# Altium PCB Kasli-DIOT.PCBDOC (part 1 of 23)
Units mm, origin at the board's own origin, x right, y up, seen from the top; angles counter-clockwise.
Board outline 222.9 x 100 mm, 10 copper layers (TopLayer, Layer 2, Layer 3, Layer 4, Layer 5, Layer 6, Layer 7, layer 8, Layer 9, BottomLayer), stack 1.564 mm thick; 977 components, 900 nets, 4676 pads, 2725 vias.
Unrouted connection lines stored in the file: 17.
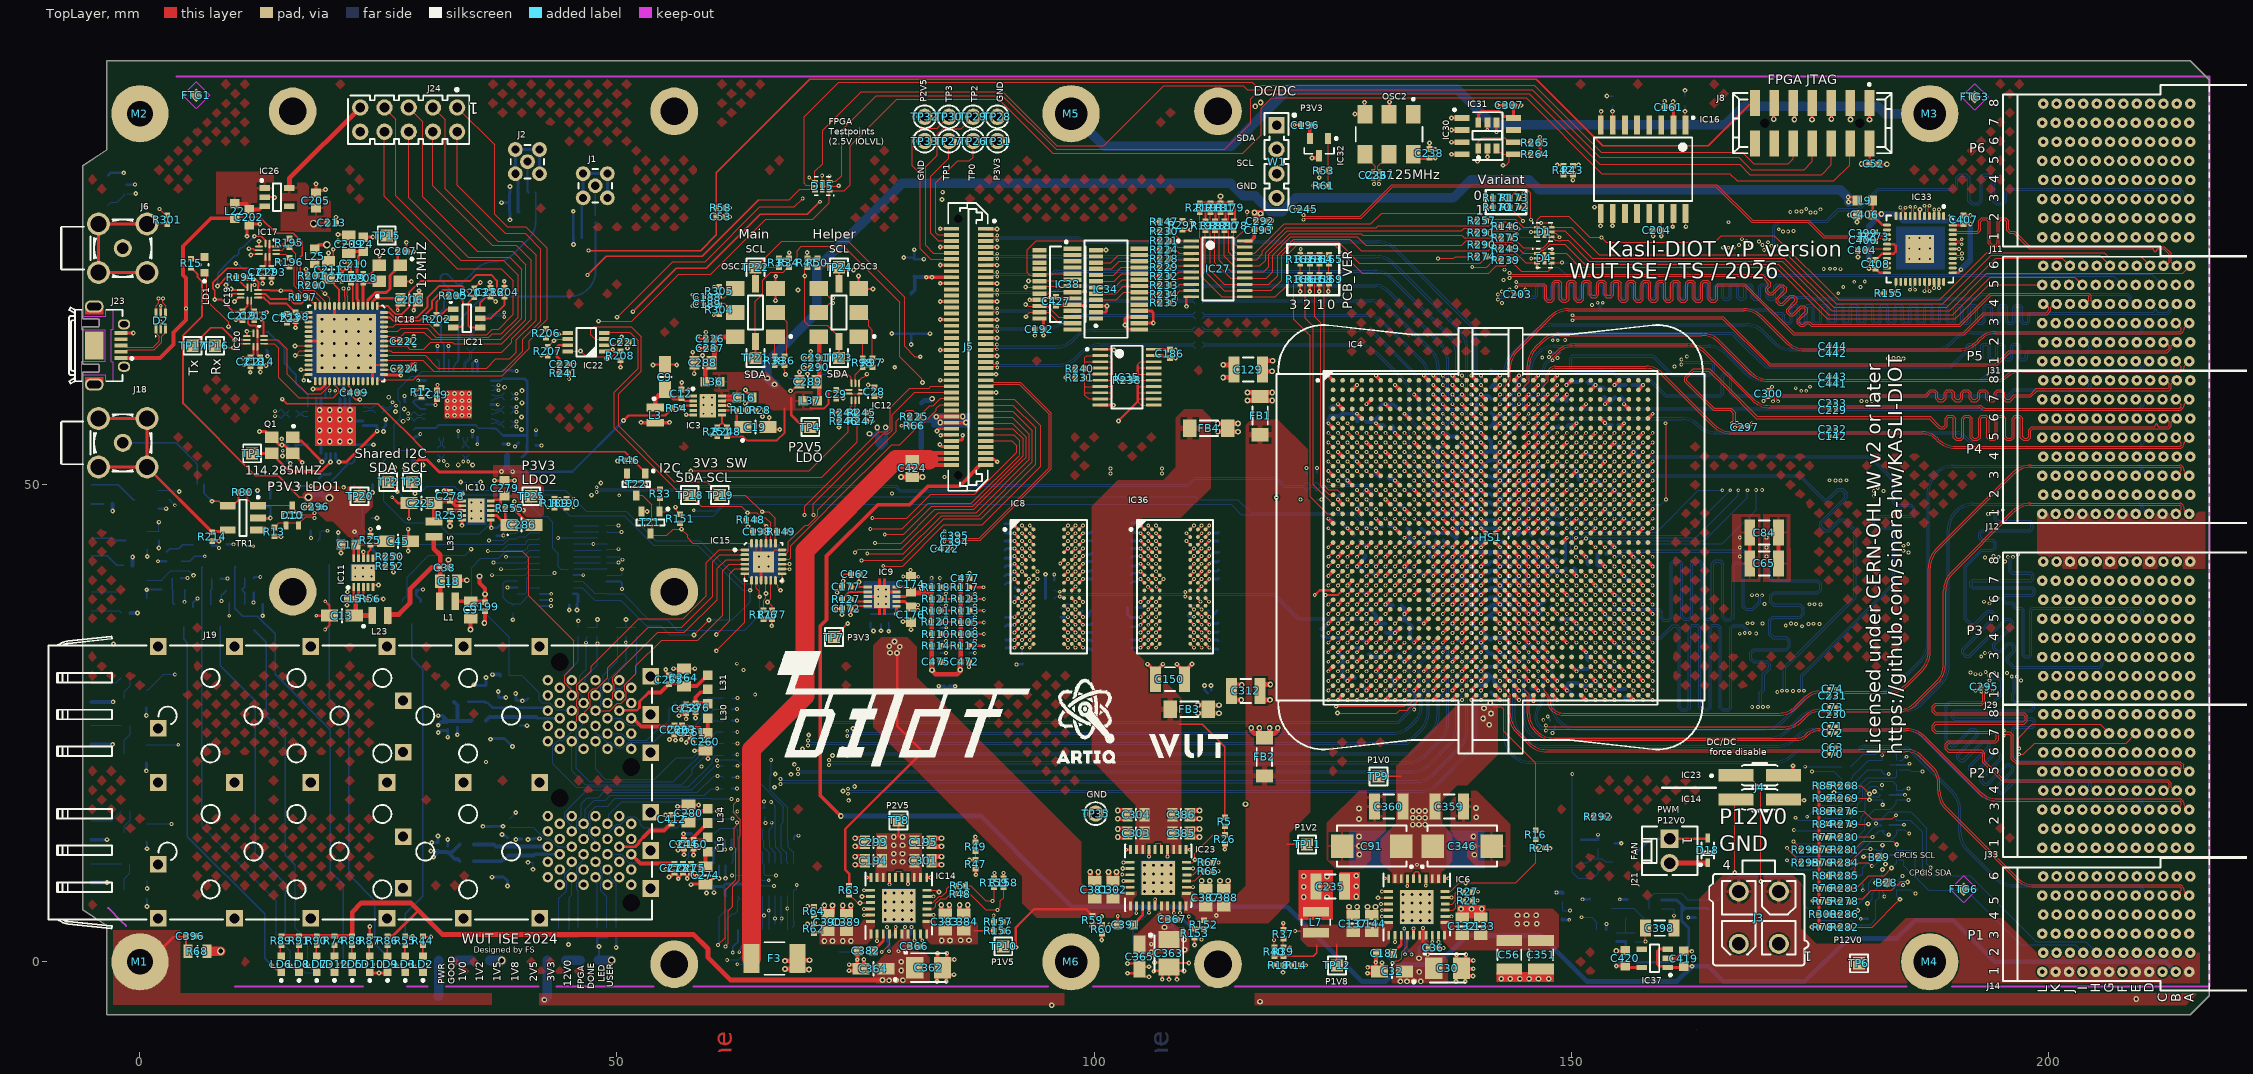
[diagram p0: TopLayer view]
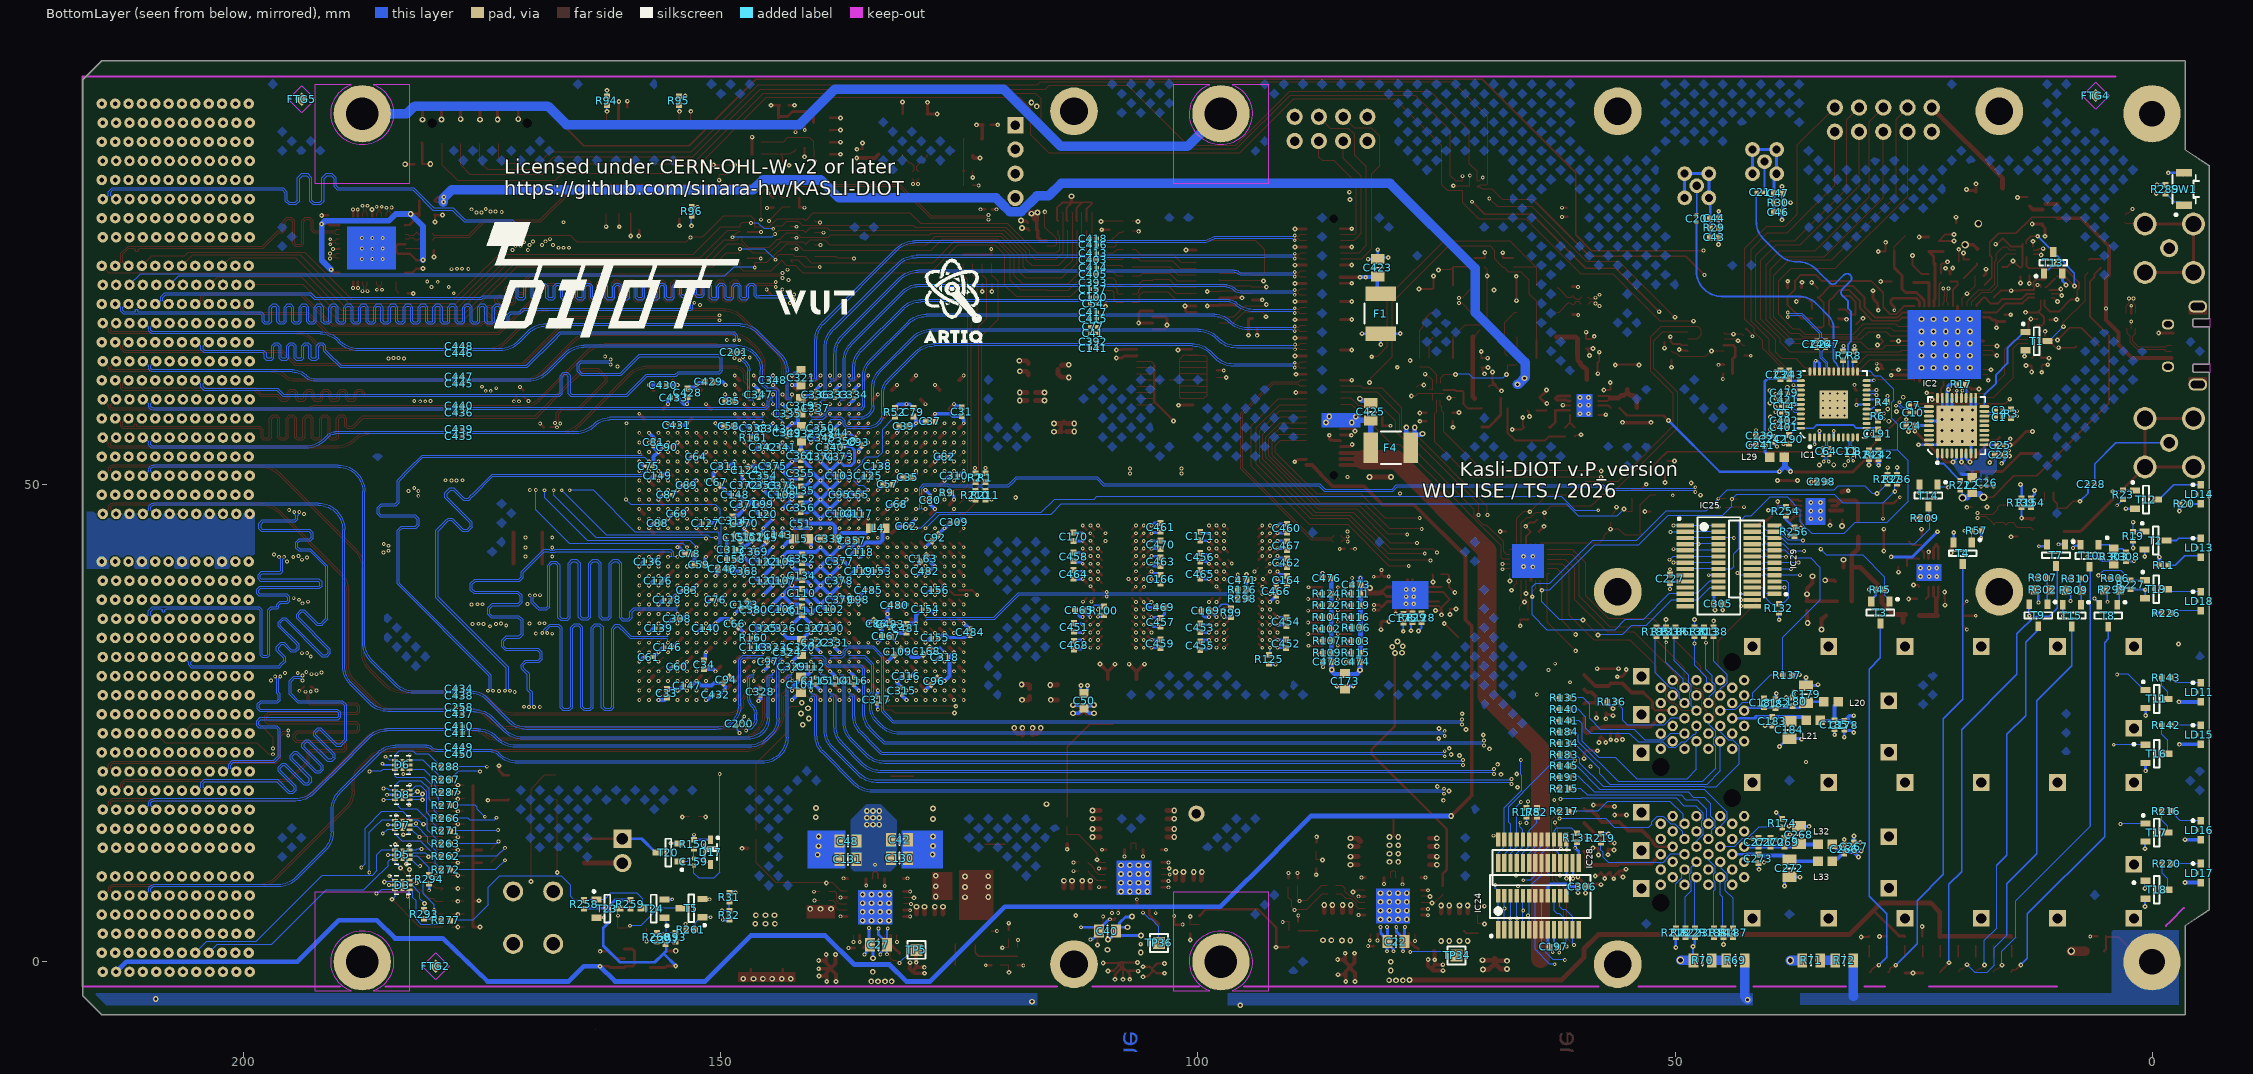
[diagram p1: BottomLayer view, seen from below]
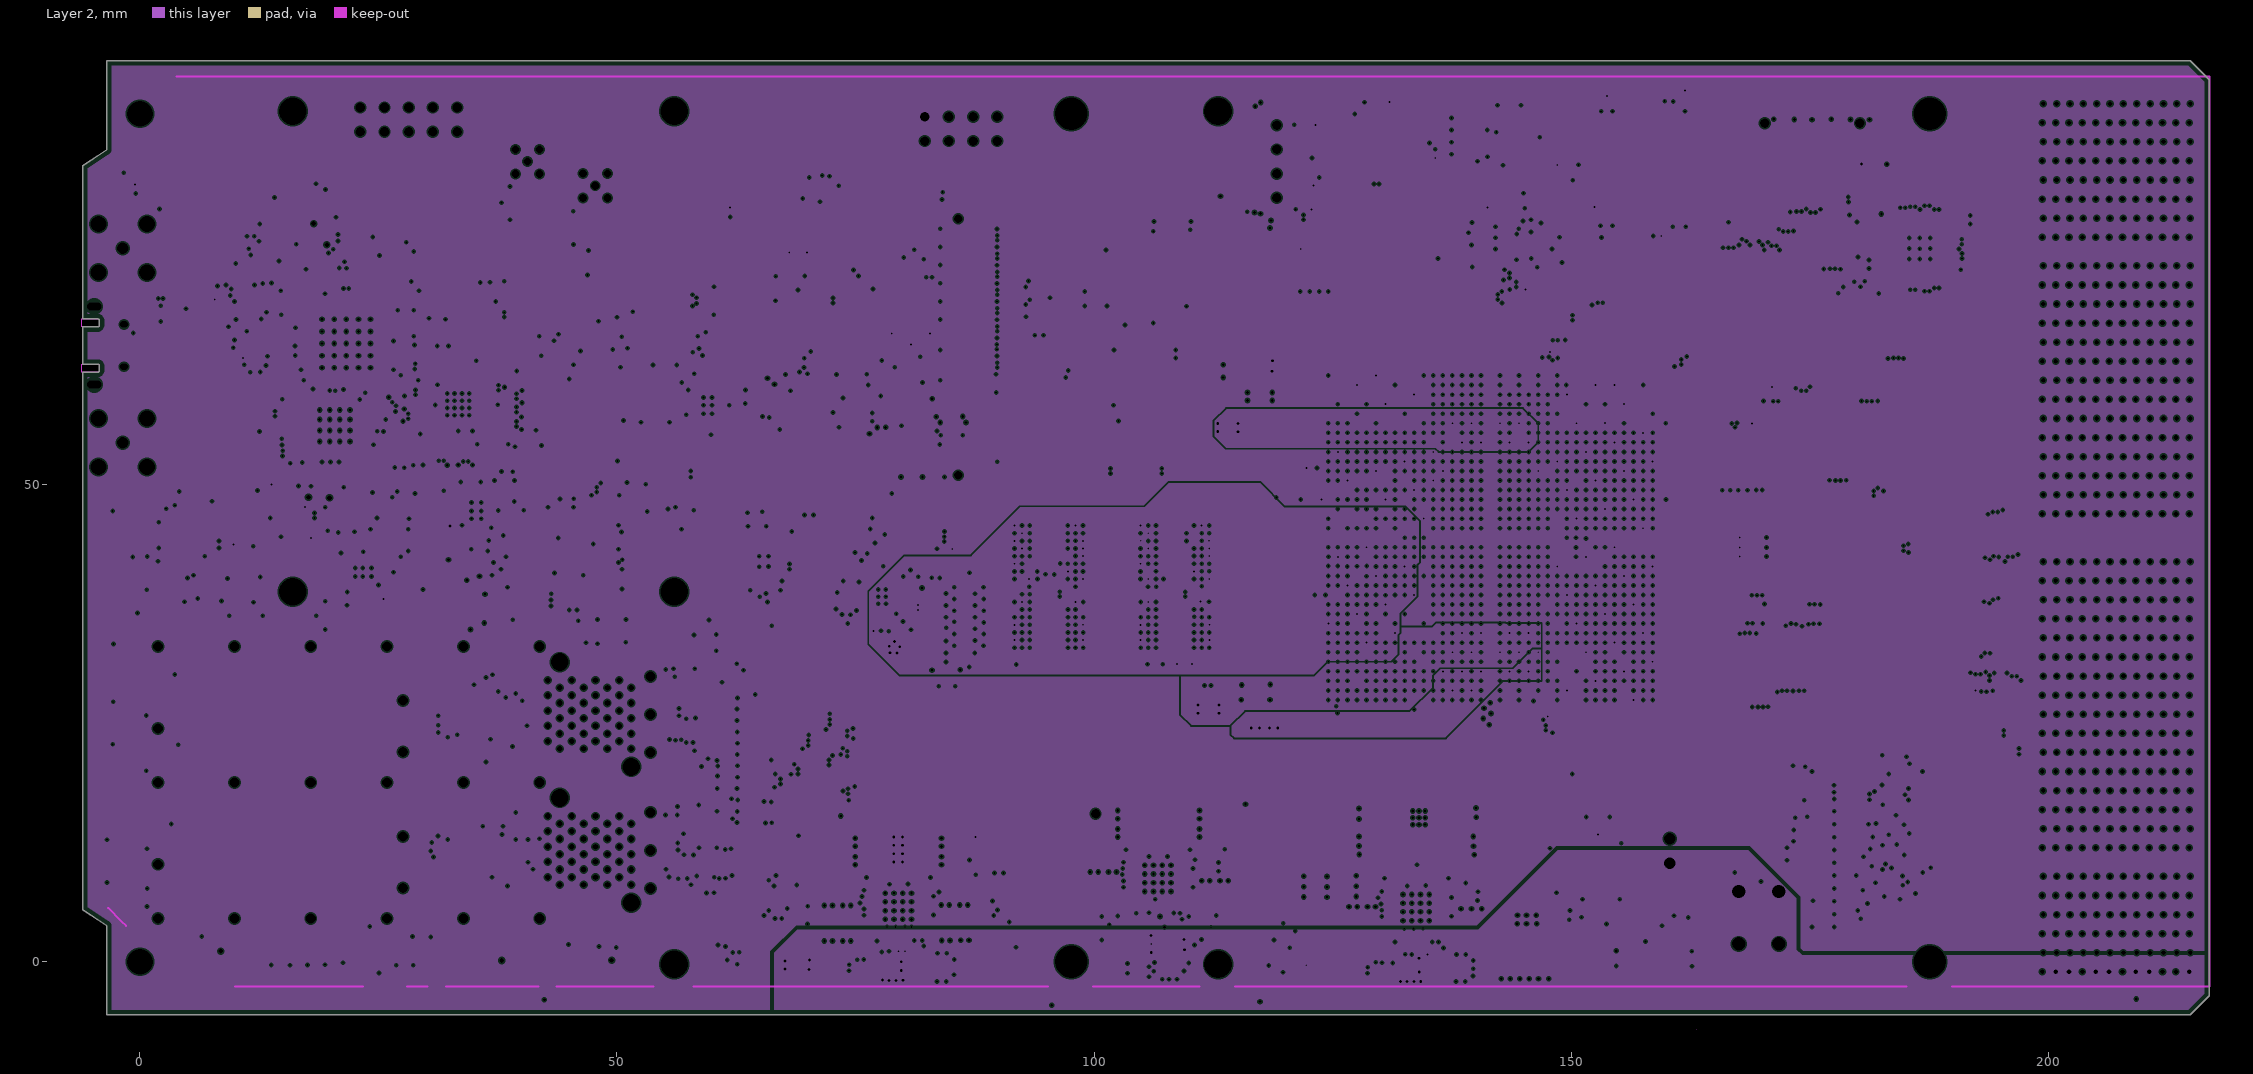
[diagram p2: Layer 2, clearances drawn from the general rule]
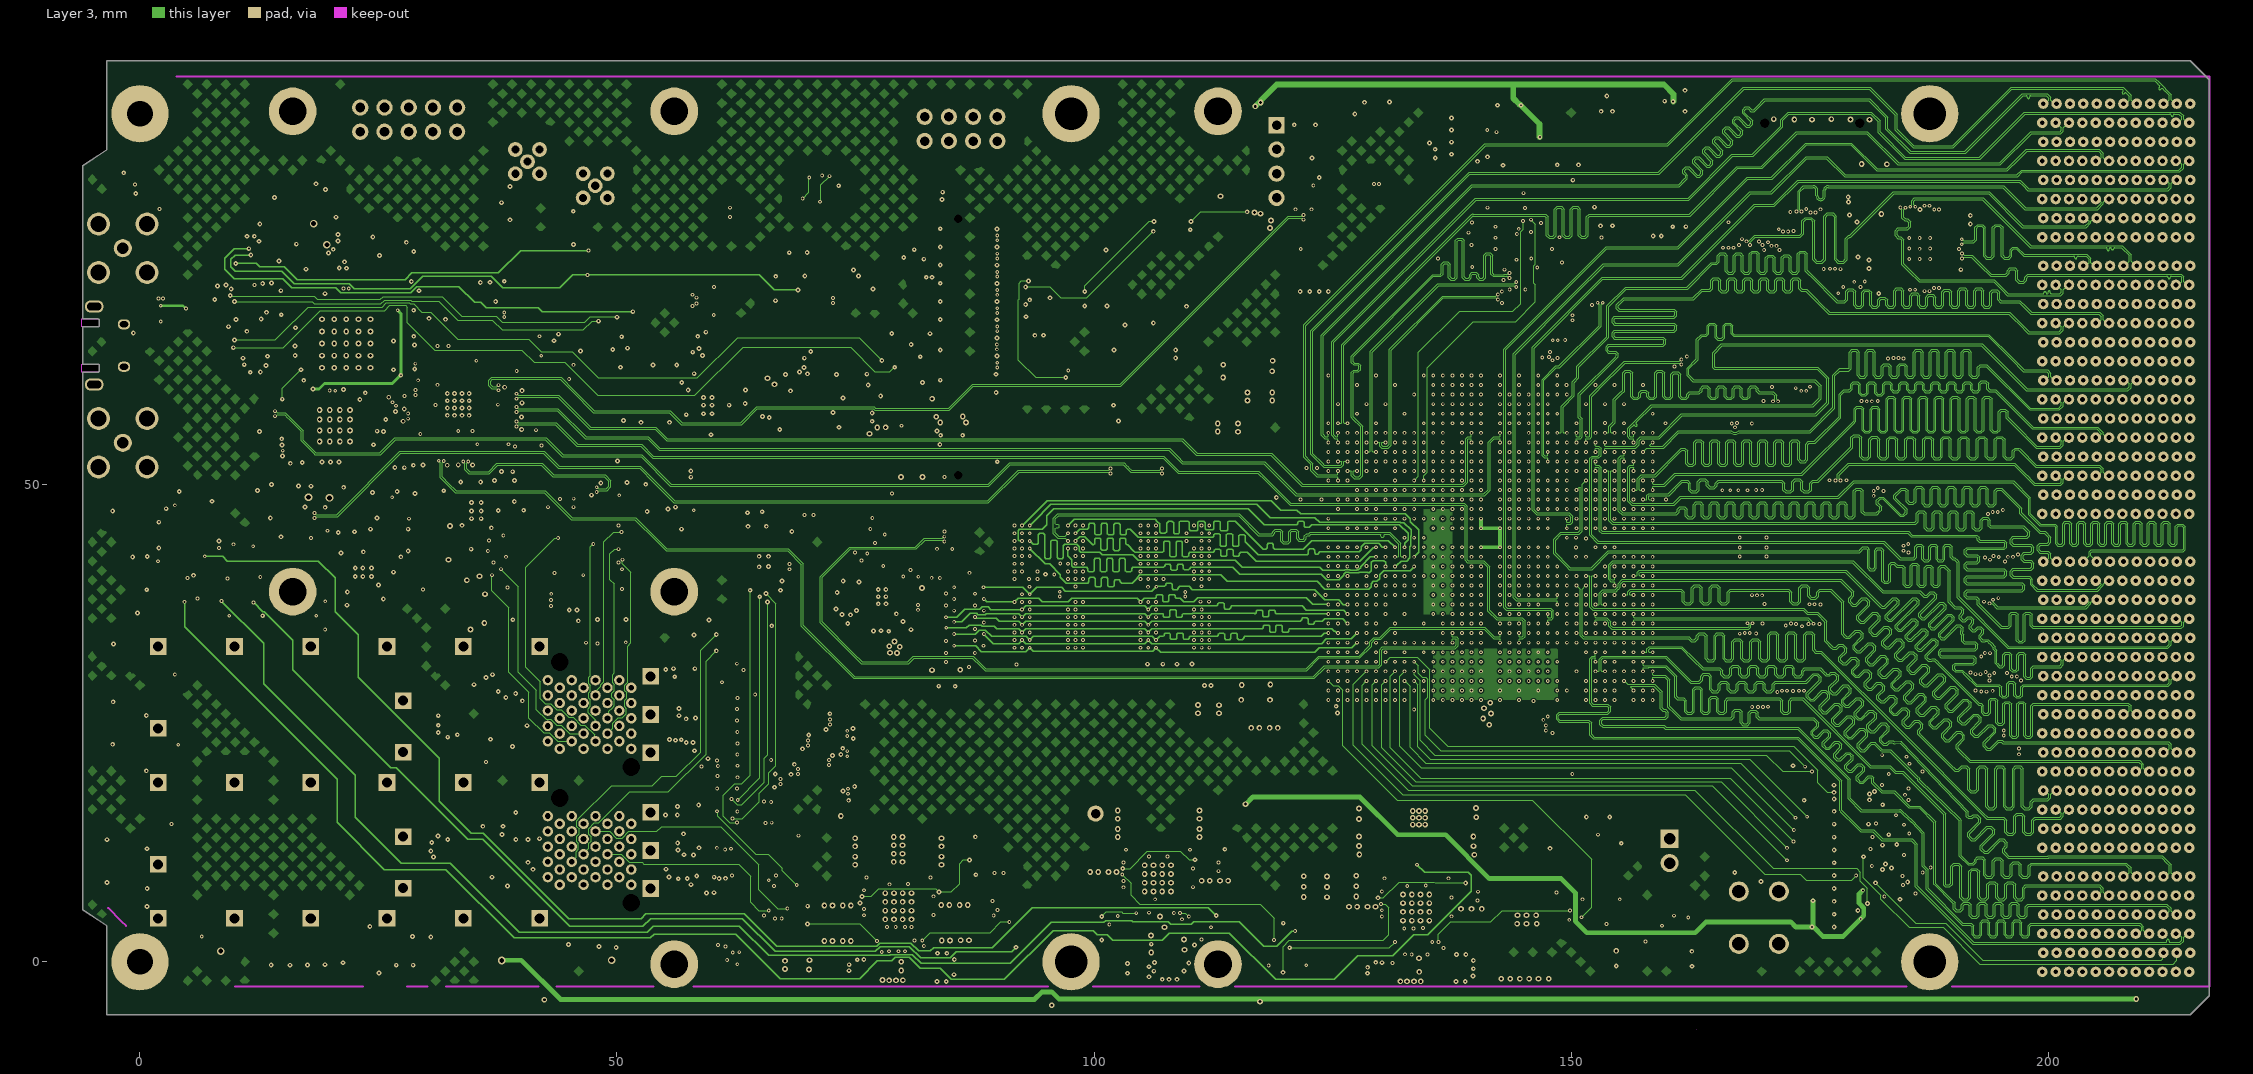
[diagram p3: Layer 3]
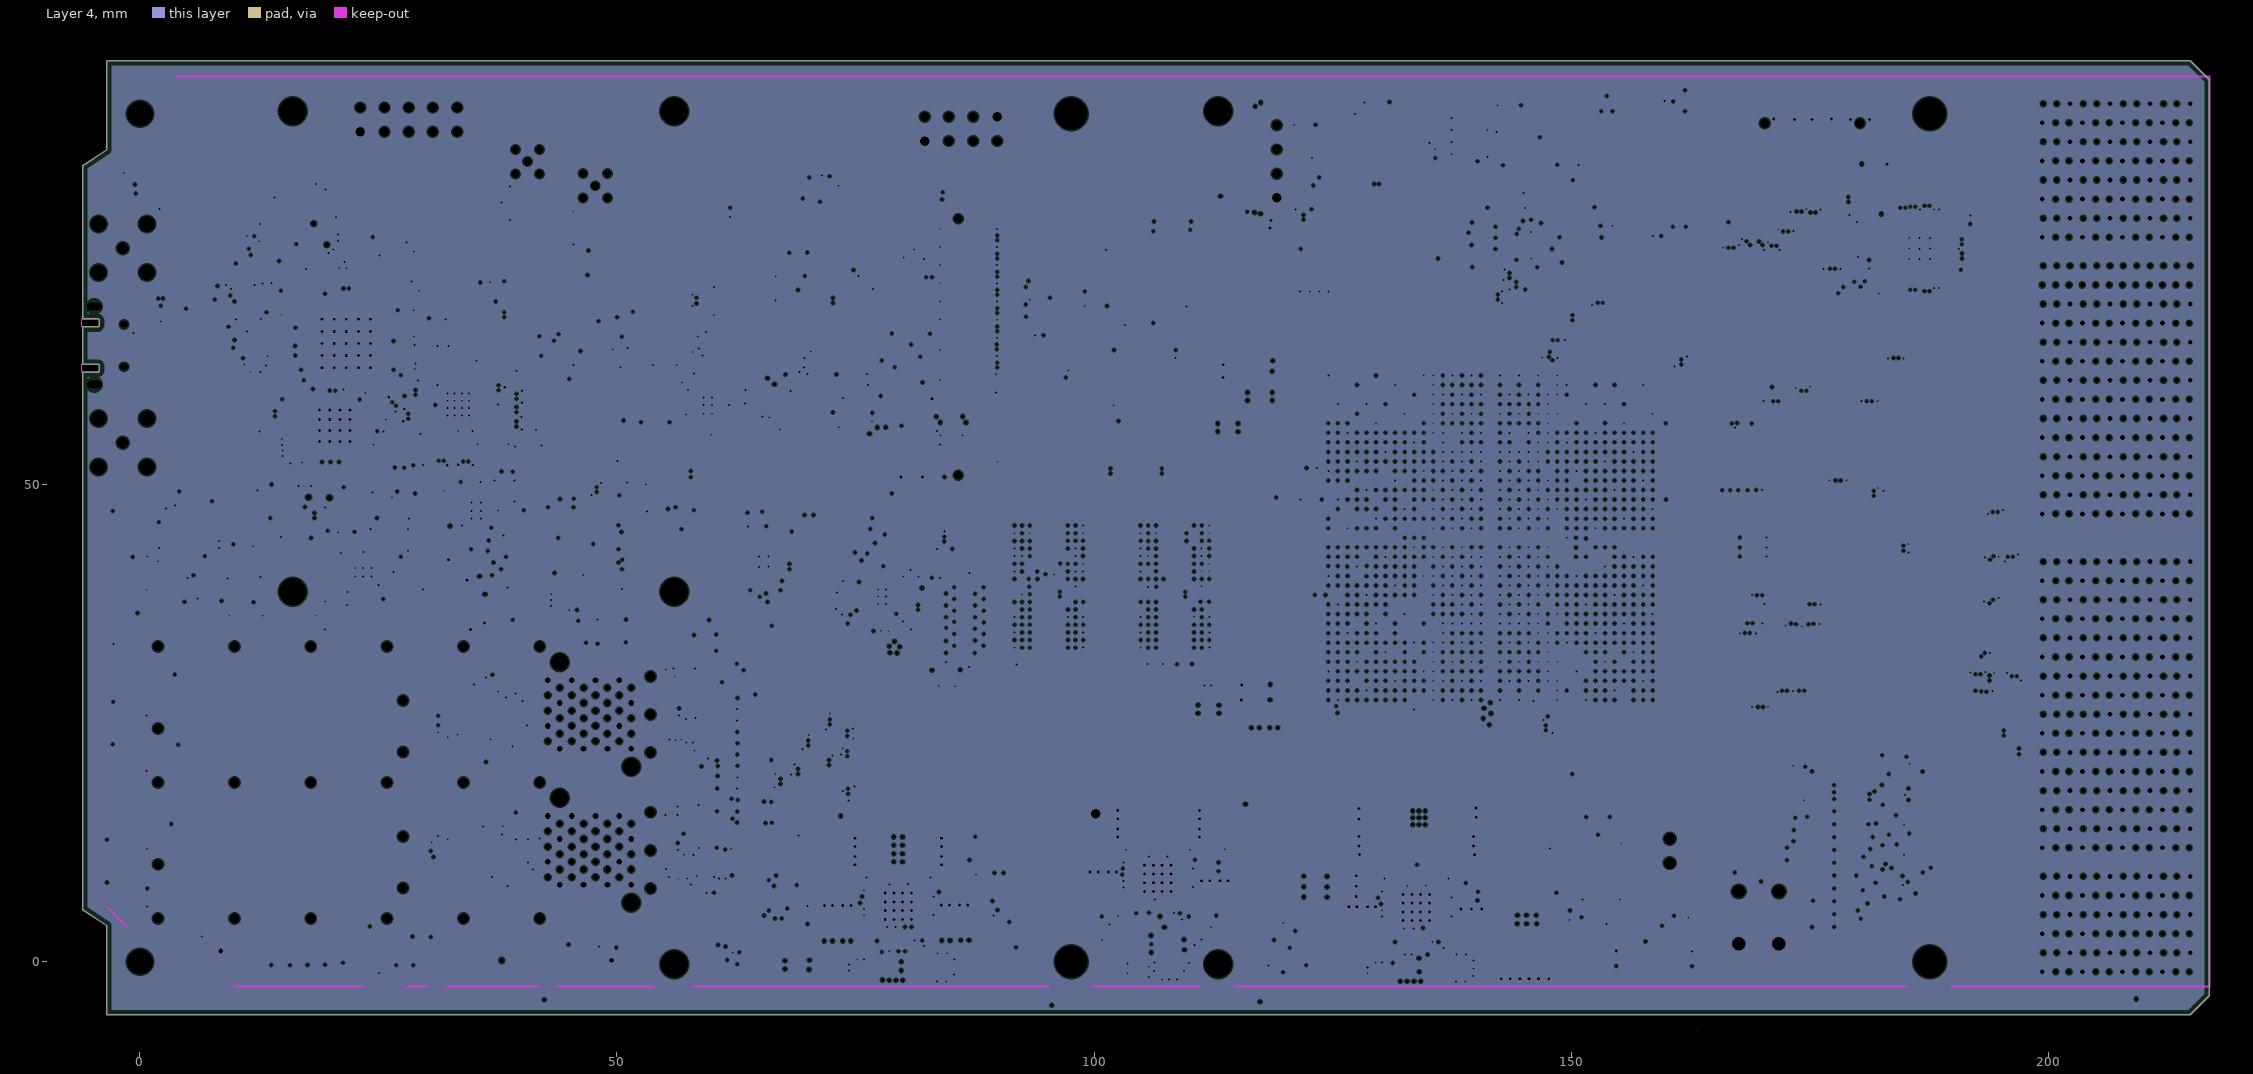
[diagram p4: Layer 4, clearances drawn from the general rule]
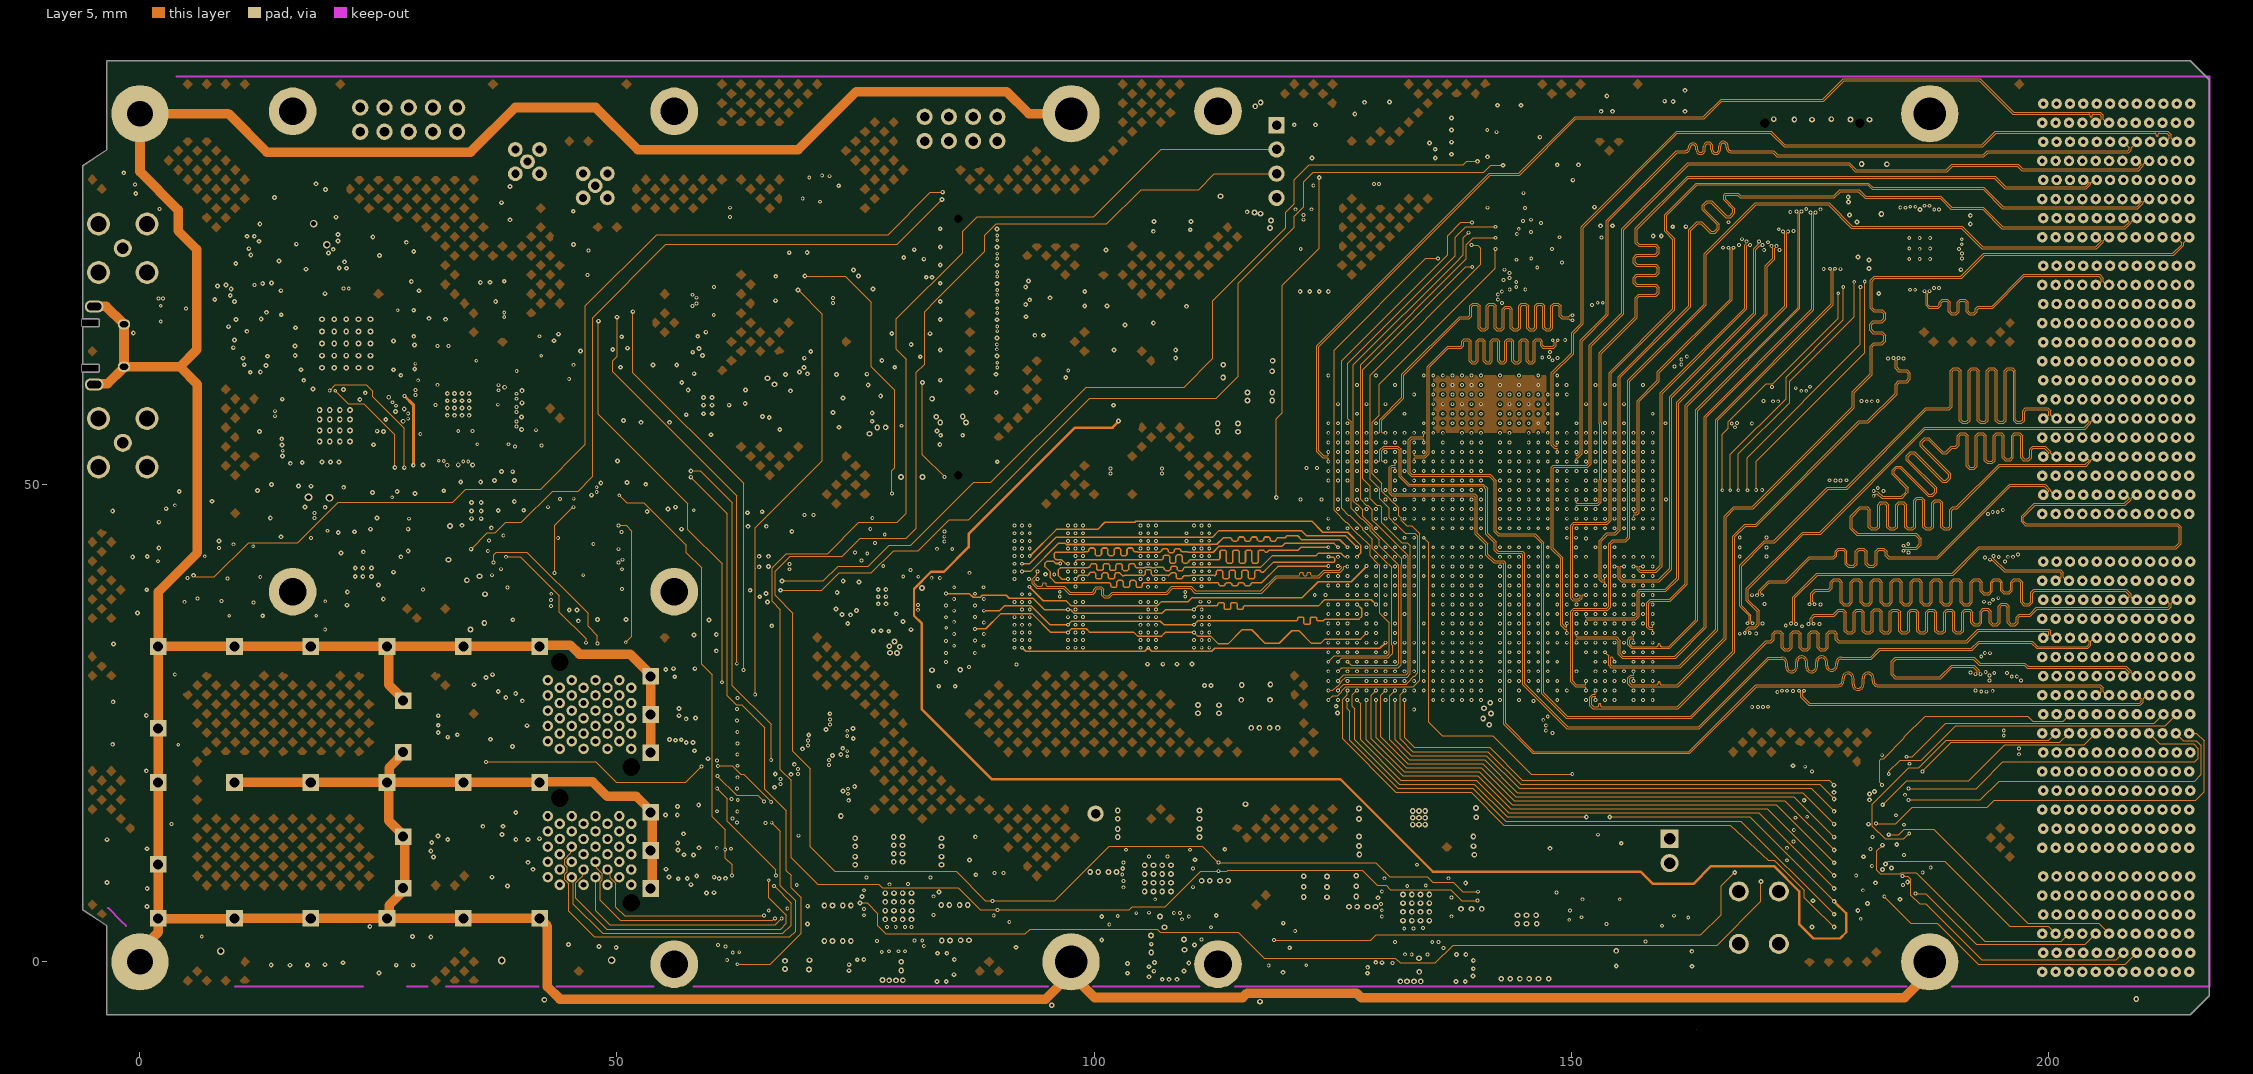
[diagram p5: Layer 5]
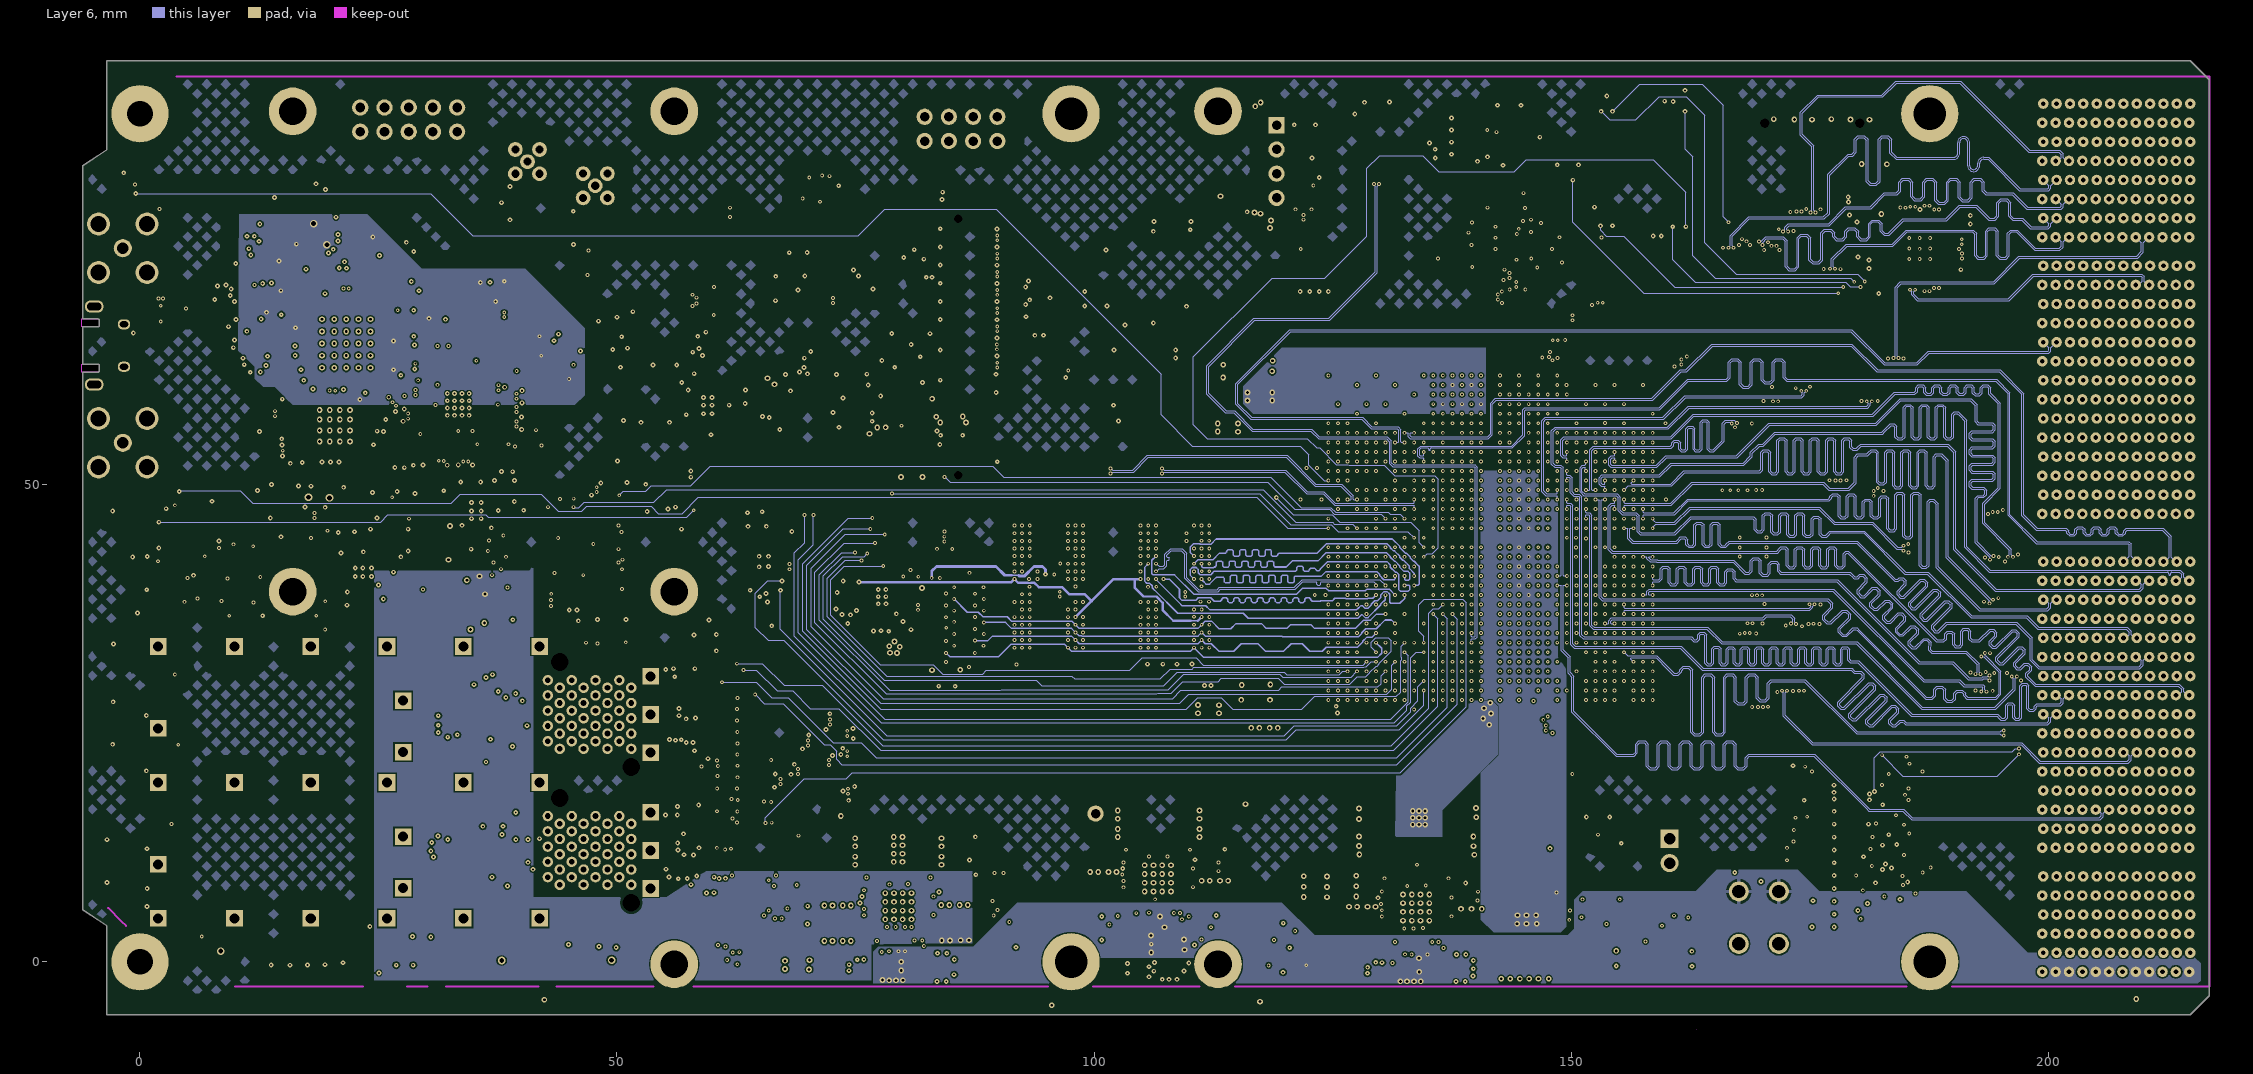
[diagram p6: Layer 6]
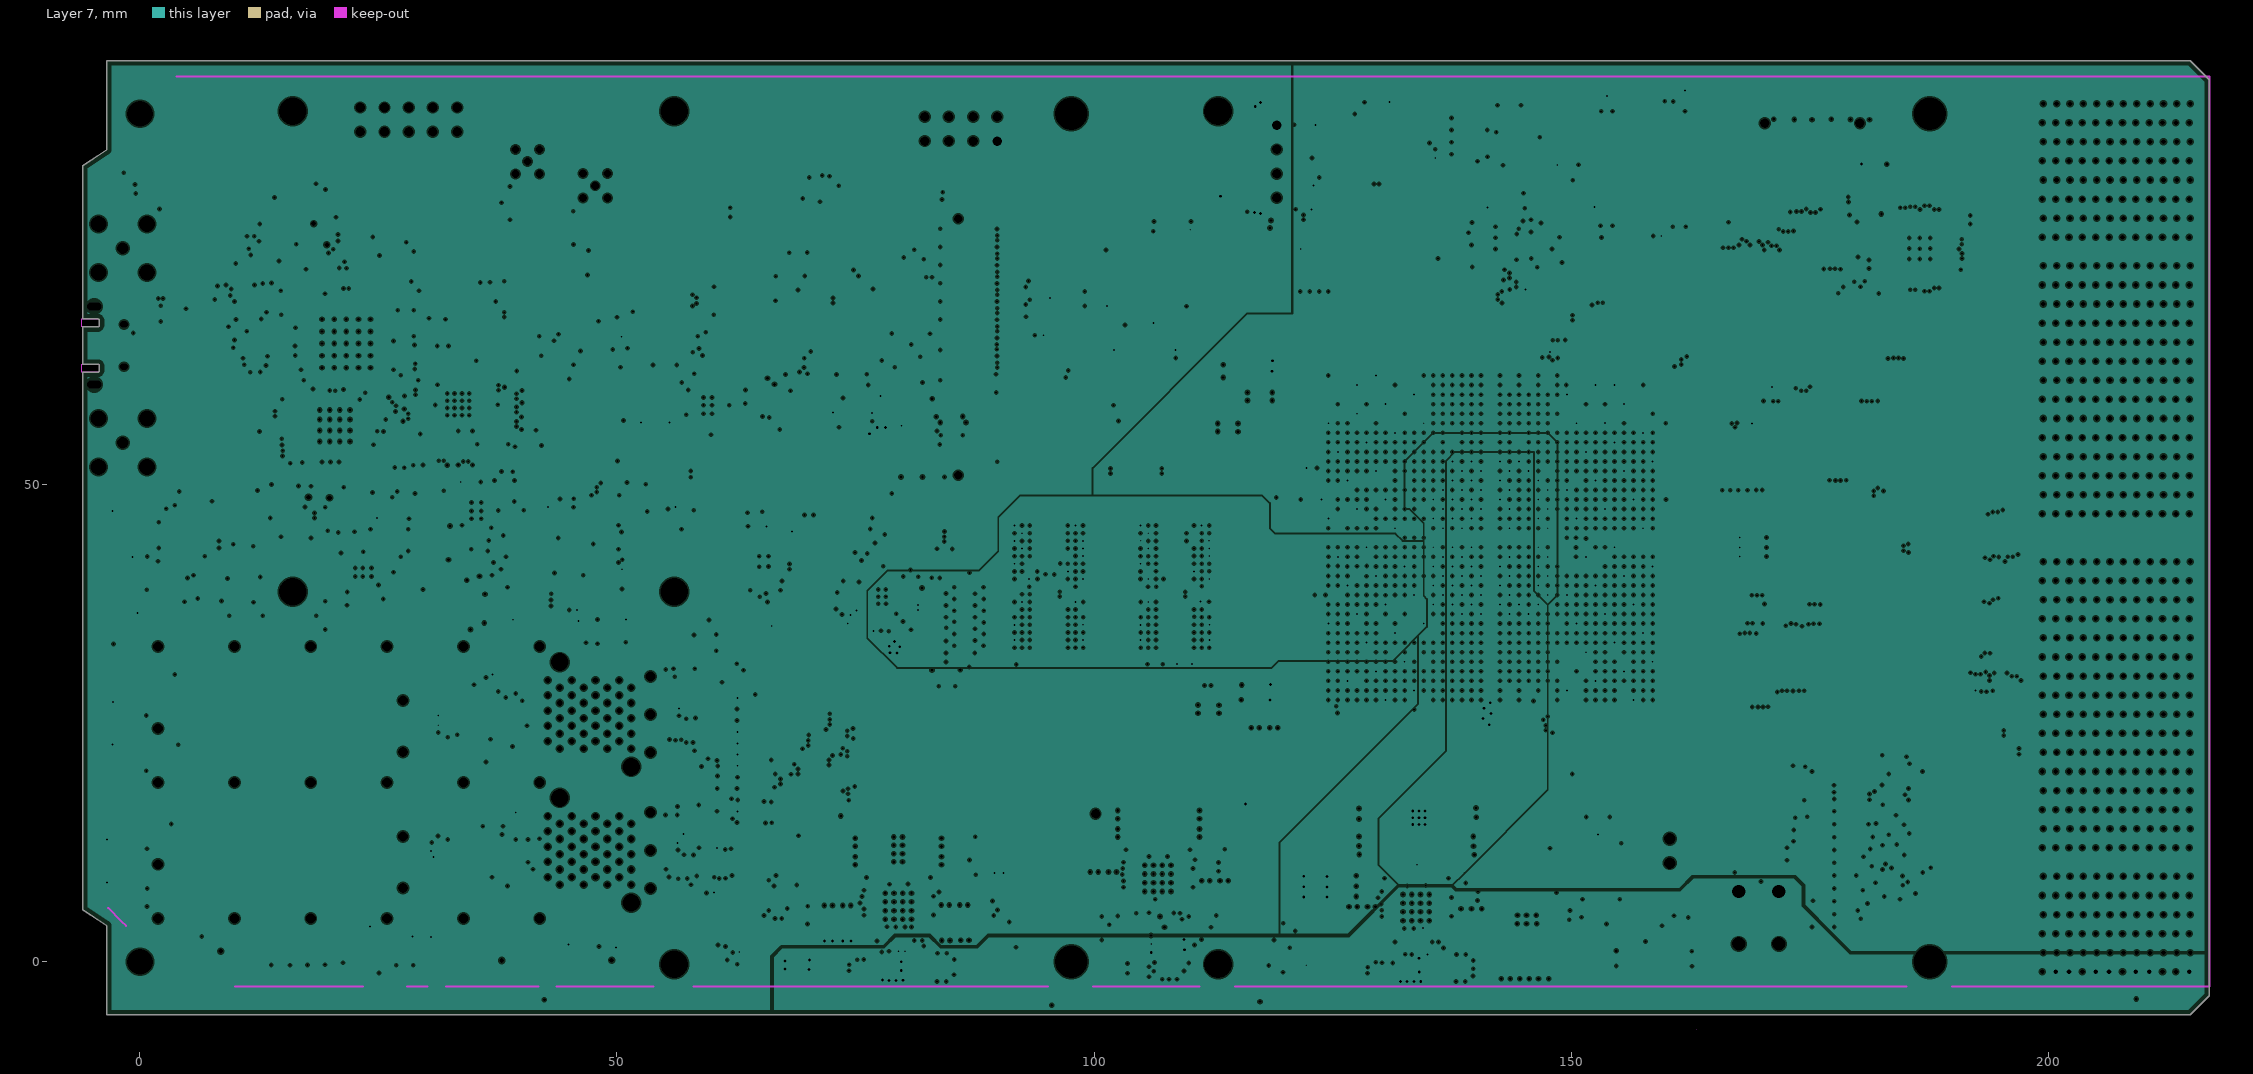
[diagram p7: Layer 7, clearances drawn from the general rule]
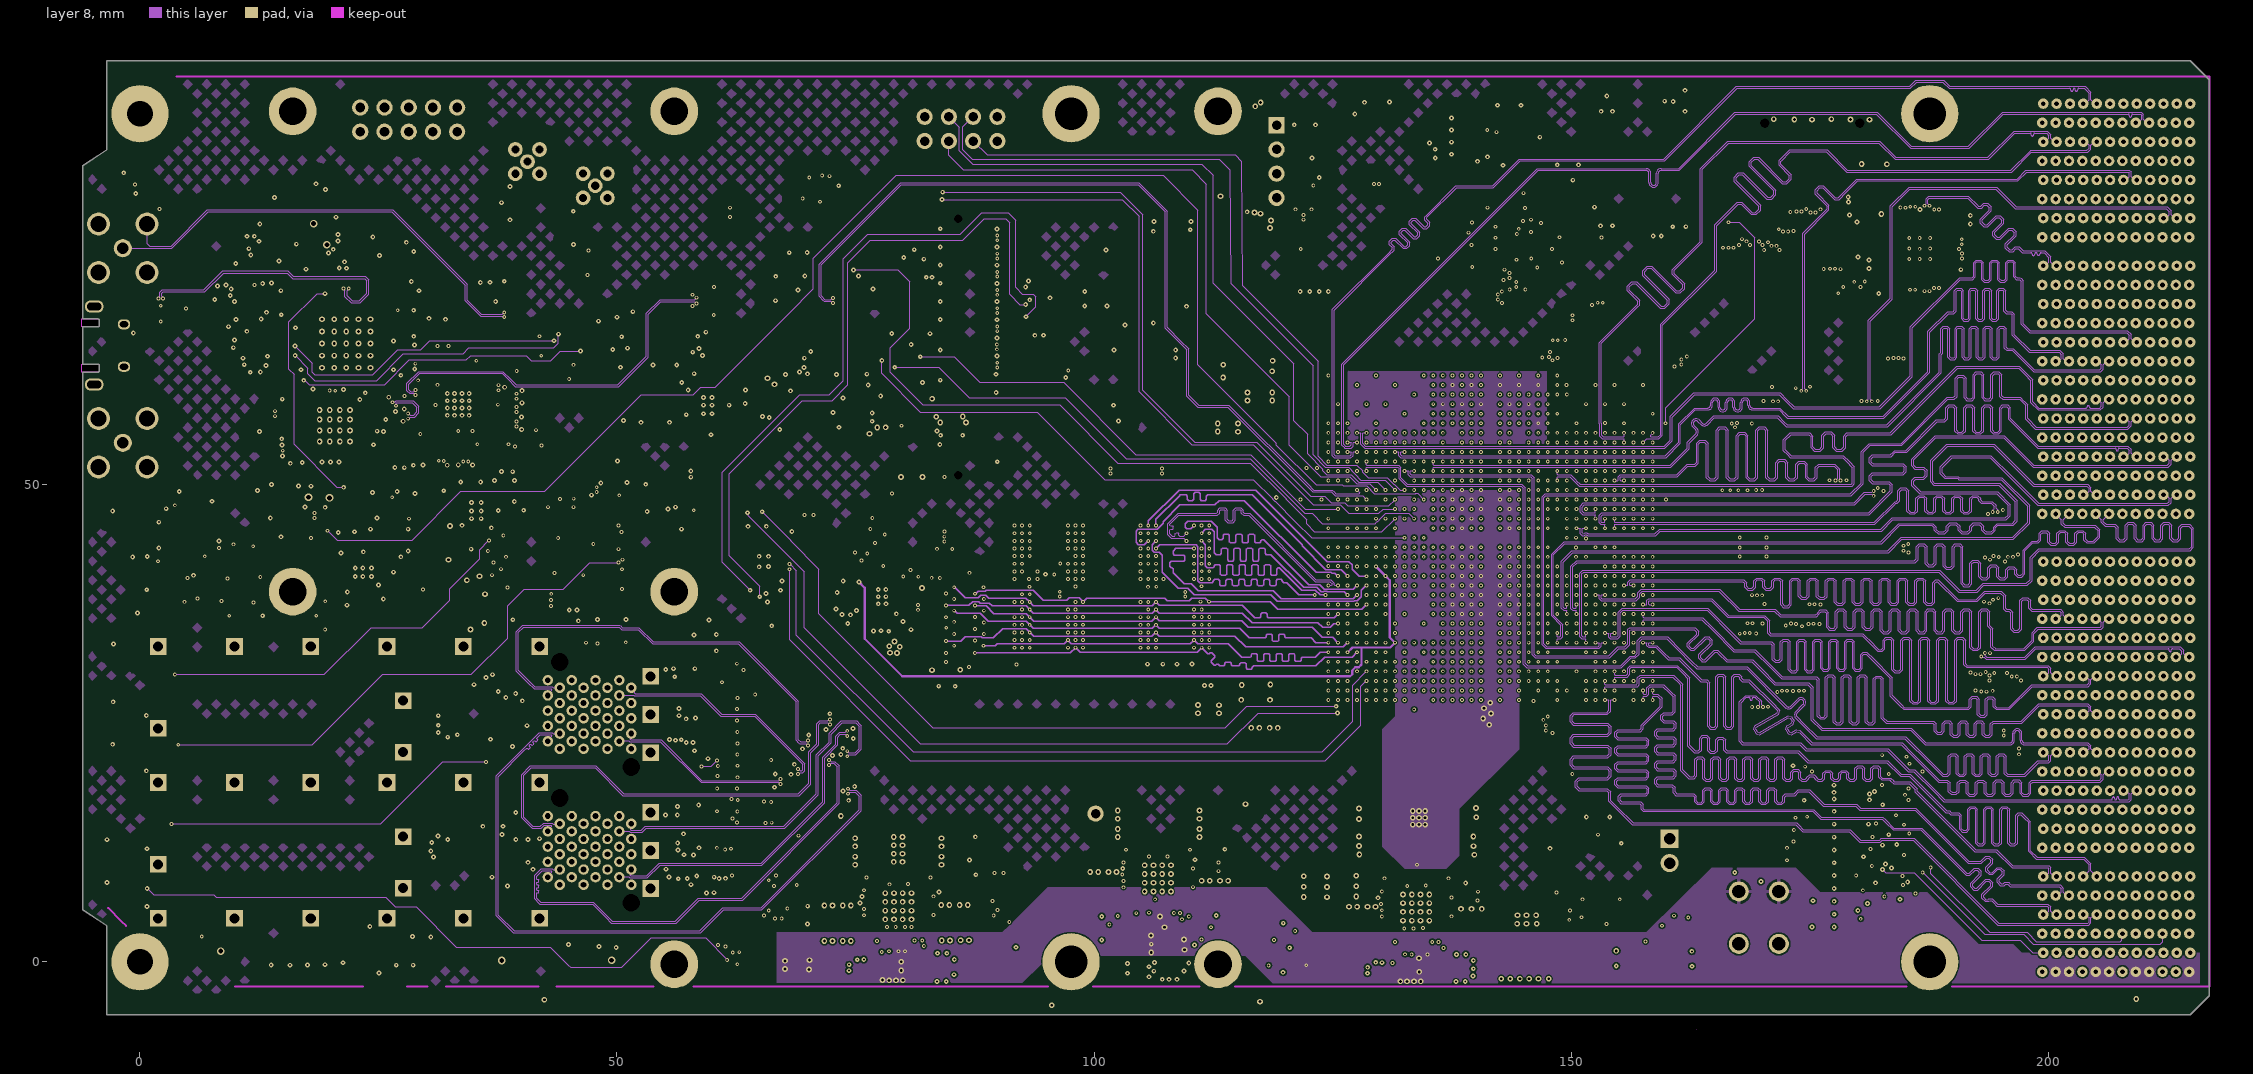
[diagram p8: layer 8]
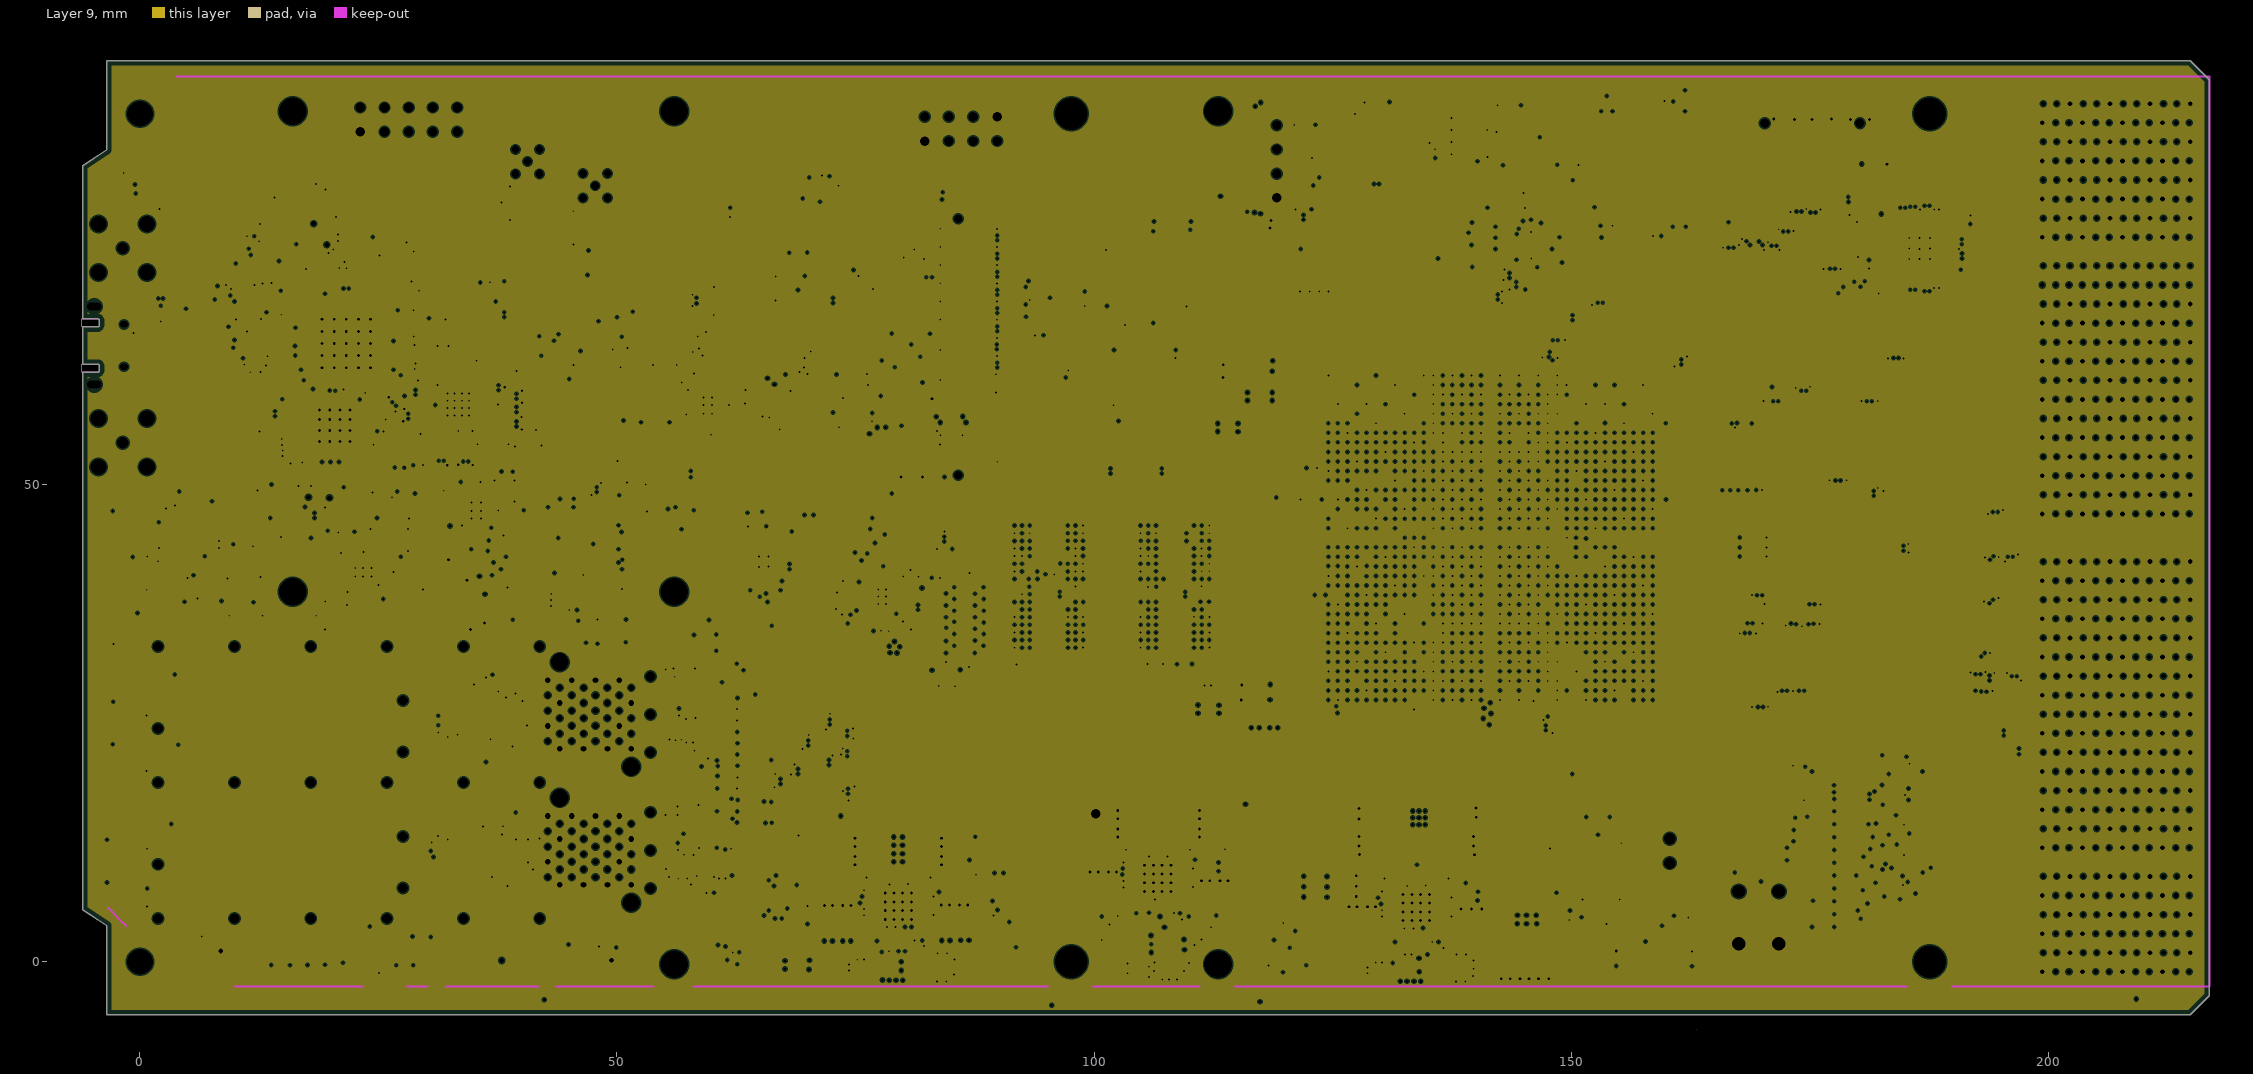
[diagram p9: Layer 9, clearances drawn from the general rule]

## Layer stack, top to bottom
TopSolder: solder mask 0.0225, Solder Resist, Dk 3.5
TopLayer: signal copper 0.035
Dielectric1: core 0.1, FR-4, Dk 4.2
Layer 2: plane copper 0.018, net (Multiple Nets)
Dielectric2: prepreg 0.2, FR-4, Dk 4.1
Layer 3: signal copper 0.018
Dielectric3: prepreg 0.1, FR-4, Dk 4.1
Layer 4: plane copper 0.018, net GND
Dielectric4: prepreg 0.1, FR-4, Dk 4.1
Layer 5: signal copper 0.018
Dielectric5: core 0.35, FR-4, Dk 4.2
Layer 6: signal copper 0.018
Dielectric6: prepreg 0.1, FR-4, Dk 4.1
Layer 7: plane copper 0.018, net (Multiple Nets)
Dielectric7: prepreg 0.1, FR-4, Dk 4.1
layer 8: signal copper 0.018
Dielectric8: prepreg 0.2, FR-4, Dk 4.1
Layer 9: plane copper 0.018, net GND
Dielectric9: core 0.1, FR-4, Dk 4.2
BottomLayer: signal copper 0.035
BottomSolder: solder mask 0.0225, Solder Resist, Dk 3.5

## Board outline
-6,61.8 -4.45,61.8 ccw(c-4.45,62) -4.25,62 -4.25,62.45 ccw(c-4.45,62.45) -4.45,62.65 -6,62.65 -6,66.55 -4.45,66.55 ccw(c-4.45,66.75) -4.25,66.75 -4.25,67.2 ccw(c-4.45,67.2) -4.45,67.4 -6,67.4 -6,83.45 -3.5,85.1 -3.5,94.45 214.9,94.45 216.9,92.45 216.9,-3.55 214.9,-5.55 -3.5,-5.55 -3.5,3.8 -6,5.45

## Design rules (kind name [scope] priority, off if disabled: settings)
AcuteAngle [All] p1: minimum=4.40000000000000E+0001 checktracksonly=FALSE
AssemblyTestPointUsage [All] p1 off:
AssemblyTestpoint [All] p1 off: testpointundercomponent=TRUE minsize=1.016 maxsize=2.54 preferedsize=1.524 minholesize=0 maxholesize=1.016 preferedholesize=0.813 testpointgrid=0.025 usegrid=TRUE gridtolerance=0 allowsidetop=TRUE allowsidebottom=TRUE
BoardOutlineClearance [All] p1: gap=0.4 ignorepadtopadclearanceinfootprint=FALSE
Clearance Clearance_NPTH [(HoleDiameter > 0) And (PadIsPlated = 'False')] p1: gap=0.254 ignorepadtopadclearanceinfootprint=FALSE
Clearance Clearance_D80 [InDifferentialPair('DDR_CK')] p2: gap=0.085 ignorepadtopadclearanceinfootprint=FALSE
Clearance Clearance_ddr [InNetClass('SE40') or InNetClass('D80') vs WithinRoom('U_FPGA_SDRAM')] p3: gap=0.085 ignorepadtopadclearanceinfootprint=FALSE
Clearance Clearance_poly_balancing [InPolygonClass('Copper_balancing') vs OnLayer('KeepOutLayer')] p4: gap=0.2 ignorepadtopadclearanceinfootprint=FALSE
Clearance Clearance_poly_balancing_1 [InPolygonClass('Copper_balancing') vs InAnyNet or IsPad] p5: gap=2 ignorepadtopadclearanceinfootprint=FALSE
Clearance Clearance_FTG [InComponent('FTG*') vs InComponent('FTG*')] p6: gap=0.1 ignorepadtopadclearanceinfootprint=TRUE except(0: SMDPad-Region; 0.15: THPad-Fill THPad-Poly THPad-Region Via-Fill Via-Poly Via-Region; 0.2: Arc-Fill Arc-Poly Arc-Region Track-Fill Track-Poly Track-Region SMDPad-Fill SMDPad-Poly)
Clearance Clearance_inner [(OnLayer('MidLayer1') OR OnLayer('MidLayer2') OR OnLayer('SignalLayer1'))] p7: gap=0.25 ignorepadtopadclearanceinfootprint=FALSE except(0: Arc-Hole SMDPad-Hole THPad-Hole Via-Hole Fill-Hole Poly-Hole Region-Hole Text-Hole; 0.076: Arc-Arc Arc-Track Arc-SMDPad Track-Track Track-SMDPad SMDPad-SMDPad SMDPad-Fill SMDPad-Region THPad-Fill THPad-Region; 0.1: Track-THPad Track-Region Region-Region; 0.127: SMDPad-Poly THPad-Poly; 0.15: Arc-Via Track-Via Via-Fill Via-Poly Via-Region; 0.2: SMDPad-Via THPad-Via; 0.254: Arc-Text Track-Text SMDPad-Text THPad-Text Via-Text Fill-Text Poly-Text Region-Text Text-Text)
Clearance [All] p8: gap=0.1 ignorepadtopadclearanceinfootprint=TRUE except(0.15: THPad-Poly Via-Poly; 0.2: Track-Poly SMDPad-Poly)
Clearance Clearance_via [IsVia vs IsVia] p9 off: gap=0.254 ignorepadtopadclearanceinfootprint=FALSE except(0: Arc-Hole Track-Hole SMDPad-Hole THPad-Hole Via-Hole Fill-Hole Poly-Hole Region-Hole Text-Hole; 0.076: Arc-Track Arc-SMDPad Track-Track Track-SMDPad SMDPad-SMDPad SMDPad-Fill SMDPad-Region THPad-Fill THPad-Region; 0.08: Arc-Arc; 0.1: Arc-Fill Arc-Region Track-Fill Track-Region Fill-Fill Fill-Region; 0.127: Arc-Poly Track-Poly SMDPad-Poly THPad-Poly Fill-Poly Poly-Poly Poly-Region Region-Region; 0.15: Arc-Via Track-Via SMDPad-Via Via-Via Via-Fill Via-Poly Via-Region; 0.2: Arc-THPad Track-THPad SMDPad-THPad THPad-THPad THPad-Via)
ComponentClearance ComponentClearance_0mm_1 [InComponent('IC34')             or InComponent('R238') vs InComponent('IC38')     or InComponent('IC35')] p1: gap=-1 collisioncheckmode=3 verticalgap=-1 showdistances=FALSE
ComponentClearance ComponentClearance_0mm [InComponent('FTG*')  or (ObjectKind = '3D Body') or InComponent('TP*') or InComponent('ic30') or InComponent('ic31')  or InComponent('ic24') or InComponent('ic25')  or InComponent('ic28') or InComponent('ic29') or InComponent('c305')  or InComponent('c306')  or InComponent('ic4') or InComponent('HS1')  or InComponent('j18') or InComponent('j19') or InComponent('M1') or InComponent('M2')or InComponent('j11')or InComponent('j12')or InComponent('j14')or InComponent('j29') or InComponent('j31')or InComponent('j33') or InComponent('IC34') or InComponent('IC35') or InComponent('IC38')  or InComponent('C427') or InComponent('R238') or InComponent('J6') vs InComponent('FTG*')  or (ObjectKind = '3D Body') or InComponent('TP*') or InComponent('ic30') or InComponent('ic31')  or InComponent('ic24') or InComponent('ic25')  or InComponent('ic28') or InComponent('ic29') or InComponent('c305')  or InComponent('c306')  or InComponent('ic4') or InComponent('HS1')  or InComponent('j18') or InComponent('j19') or InComponent('M1') or InComponent('M2')or InComponent('j11')or InComponent('j12')or InComponent('j14')or InComponent('j29') or InComponent('j31')or InComponent('j33') or InComponent('IC34') or InComponent('IC35') or InComponent('IC38')  or InComponent('C427') or InComponent('R238') or InComponent('J6') or InComponent('J3')] p2: gap=-1 collisioncheckmode=3 verticalgap=-1 showdistances=FALSE
ComponentClearance ComponentClearance_0mm_Mech [InComponent('M*') vs InAnyComponent and OnTopLayer] p3: gap=-1 collisioncheckmode=3 verticalgap=-1 showdistances=FALSE
ComponentClearance ComponentClearance_Enclosure [InComponent('M*') or InComponent('J21') vs Identifier='SI-KasliDiotEnclosure-A01.iam.v2'] p4: gap=-1 collisioncheckmode=3 verticalgap=-1 showdistances=FALSE
ComponentClearance [All] p5: gap=0.15 collisioncheckmode=3 verticalgap=0.15 showdistances=FALSE
DiffPairsRouting DiffPairsRouting_DDR [InNetClass('D80')] p1: maxlimit=0.1 minlimit=0.09 mostfreqgap=0.1 toplayer_maxgap=0.09 toplayer_prefgap=0.09 toplayer_minwidth=0.12 toplayer_maxwidth=0.12 toplayer_prefwidth=0.12 midlayer2_mingap=0.1 midlayer2_minwidth=0.11 midlayer2_maxwidth=0.11 midlayer2_prefwidth=0.11 midlayer3_mingap=0.1 midlayer3_minwidth=0.12 midlayer3_maxwidth=0.12 midlayer3_prefwidth=0.12 midlayer4_mingap=0.1 midlayer4_minwidth=0.12 midlayer4_maxwidth=0.12 midlayer4_prefwidth=0.12 midlayer7_mingap=0.1 midlayer7_minwidth=0.11 midlayer7_maxwidth=0.11 midlayer7_prefwidth=0.11 bottomlayer_maxgap=0.09 bottomlayer_prefgap=0.09 bottomlayer_minwidth=0.12 bottomlayer_maxwidth=0.12 bottomlayer_prefwidth=0.12 impedanceprofiledriven=TRUE impedanceprofileid={ECA0DBA4-A4E1-4D84-A065-75DCE5BDB592} impedanceprofilevalue=80.000000 maxuncoupledlength=12.7
DiffPairsRouting DiffPairsRouting_100_Ohm [InNetClass('D100')] p2: maxlimit=0.127 minlimit=0.127 mostfreqgap=0.127 toplayer_minwidth=0.095 toplayer_maxwidth=0.095 toplayer_prefwidth=0.095 midlayer2_minwidth=0.075 midlayer2_maxwidth=0.075 midlayer2_prefwidth=0.075 midlayer3_minwidth=0.08 midlayer3_maxwidth=0.08 midlayer3_prefwidth=0.08 midlayer4_minwidth=0.08 midlayer4_maxwidth=0.08 midlayer4_prefwidth=0.08 midlayer7_minwidth=0.075 midlayer7_maxwidth=0.075 midlayer7_prefwidth=0.075 bottomlayer_minwidth=0.095 bottomlayer_maxwidth=0.095 bottomlayer_prefwidth=0.095 impedanceprofiledriven=TRUE impedanceprofileid={1982F57B-03E1-4757-A237-F38424A46CC9} impedanceprofilevalue=100.000000 maxuncoupledlength=50
DiffPairsRouting DiffPairsRouting_90_Ohm [InNetClass('D90')] p3: maxlimit=0.127 minlimit=0.127 mostfreqgap=0.127 toplayer_minwidth=0.129 toplayer_maxwidth=0.129 toplayer_prefwidth=0.129 midlayer7_minwidth=0.102 midlayer7_maxwidth=0.102 midlayer7_prefwidth=0.102 bottomlayer_minwidth=0.129 bottomlayer_maxwidth=0.129 bottomlayer_prefwidth=0.129 impedanceprofiledriven=TRUE impedanceprofileid={2F883F46-BAAB-4C73-83E7-9B47EDEBFF7F} impedanceprofilevalue=90.000000 maxuncoupledlength=12.7
DiffPairsRouting [InAnyDifferentialPair] p4 off: maxlimit=0.127 minlimit=0.127 mostfreqgap=0.127 toplayer_minwidth=0.095 toplayer_maxwidth=0.095 toplayer_prefwidth=0.095 midlayer2_minwidth=0.075 midlayer2_maxwidth=0.075 midlayer2_prefwidth=0.075 midlayer3_minwidth=0.08 midlayer3_maxwidth=0.08 midlayer3_prefwidth=0.08 midlayer4_minwidth=0.08 midlayer4_maxwidth=0.08 midlayer4_prefwidth=0.08 midlayer7_minwidth=0.075 midlayer7_maxwidth=0.075 midlayer7_prefwidth=0.075 bottomlayer_minwidth=0.095 bottomlayer_maxwidth=0.095 bottomlayer_prefwidth=0.095 impedanceprofiledriven=TRUE impedanceprofileid={1982F57B-03E1-4757-A237-F38424A46CC9} impedanceprofilevalue=100.000000 maxuncoupledlength=3
FabricationTestPointUsage TestPointUsage [All] p1: valid=0 allowmultiple=FALSE
FabricationTestpoint Testpoint [All] p1: side=3 testpointundercomponent=TRUE minsize=1.016 maxsize=2.54 preferedsize=1.524 minholesize=0.508 maxholesize=1.016 preferedholesize=0.813 testpointgrid=0.025 allowsidetop=TRUE allowsidebottom=TRUE usegrid=TRUE gridtolerance=0
Height Height_FTG [InComponent('FTG*')] p1: minheight=0 maxheight=10 prefheight=1
Height Height_2 [OnLayer('BottomLayer')] p2: minheight=0 maxheight=2 prefheight=1
Height [All] p3: minheight=0 maxheight=27 prefheight=12.7
HoleSize [All] p1: absolutevalues=TRUE maxlimit=3.4 minlimit=0.15 maxpercent=80.000 minpercent=20.000
HoleToHoleClearance [All] p1: gap=0.15 allowstackedmicrovias=TRUE
MatchedLengths MatchedLengths_PECLK [InNetClass('PE_CLK')] p1: tolerance=25.4 checknetsindiffpair=TRUE checkdiffpairvsdiffpair=FALSE checkxsignals=FALSE checkothers=FALSE usedelayunits=TRUE delaytolerance=1.000000
MatchedLengths MatchedLengths_PE_CLK [InNetClass('PE_CLK')] p2: tolerance=25.4 checknetsindiffpair=FALSE checkdiffpairvsdiffpair=TRUE checkxsignals=TRUE checkothers=TRUE usedelayunits=TRUE delaytolerance=7.000000
MatchedLengths MatchedLengths_SLOT1 [InNetClass('SLOT1')] p3: tolerance=7.5 checknetsindiffpair=FALSE checkdiffpairvsdiffpair=TRUE checkxsignals=TRUE checkothers=TRUE usedelayunits=TRUE delaytolerance=50.000000
MatchedLengths MatchedLengths_SLOT2 [InNetClass('SLOT2')] p4: tolerance=7.5 checknetsindiffpair=FALSE checkdiffpairvsdiffpair=TRUE checkxsignals=TRUE checkothers=TRUE usedelayunits=TRUE delaytolerance=50.000000
MatchedLengths MatchedLengths_SLOT3 [InNetClass('SLOT3')] p5: tolerance=7.5 checknetsindiffpair=FALSE checkdiffpairvsdiffpair=TRUE checkxsignals=TRUE checkothers=TRUE usedelayunits=TRUE delaytolerance=50.000000
MatchedLengths MatchedLengths_SLOT4 [InNetClass('SLOT4')] p6: tolerance=7.5 checknetsindiffpair=FALSE checkdiffpairvsdiffpair=TRUE checkxsignals=TRUE checkothers=TRUE usedelayunits=TRUE delaytolerance=50.000000
MatchedLengths MatchedLengths_SLOT5 [InNetClass('SLOT5')] p7: tolerance=7.5 checknetsindiffpair=FALSE checkdiffpairvsdiffpair=TRUE checkxsignals=TRUE checkothers=TRUE usedelayunits=TRUE delaytolerance=50.000000
MatchedLengths MatchedLengths_SLOT6 [InNetClass('SLOT6')] p8: tolerance=7.5 checknetsindiffpair=FALSE checkdiffpairvsdiffpair=TRUE checkxsignals=TRUE checkothers=TRUE usedelayunits=TRUE delaytolerance=50.000000
MatchedLengths MatchedLengths_SLOT7 [InNetClass('SLOT7')] p9: tolerance=7.5 checknetsindiffpair=FALSE checkdiffpairvsdiffpair=TRUE checkxsignals=TRUE checkothers=TRUE usedelayunits=TRUE delaytolerance=50.000000
MatchedLengths MatchedLengths_SLOT8 [InNetClass('SLOT8')] p10: tolerance=7.5 checknetsindiffpair=FALSE checkdiffpairvsdiffpair=TRUE checkxsignals=TRUE checkothers=TRUE usedelayunits=TRUE delaytolerance=50.000000
MatchedLengths MatchedLengths_DDR_CLOCKS_STROBES [InxSignalClass('ADDR_PP1') OR InxSignalClass('ADDR_PP2') OR InxSignalClass('DATA_BL0') OR InxSignalClass('DATA_BL1') OR InxSignalClass('DATA_BL2') OR InxSignalClass('DATA_BL3')] p11: tolerance=0.3 checknetsindiffpair=TRUE checkdiffpairvsdiffpair=FALSE checkxsignals=FALSE checkothers=FALSE
MatchedLengths MatchedLengths_DATA_BL3 [InxSignalClass('DATA_BL3')] p12: tolerance=1.5 checknetsindiffpair=FALSE checkdiffpairvsdiffpair=TRUE checkxsignals=TRUE checkothers=TRUE
MatchedLengths MatchedLengths_DATA_BL2 [InxSignalClass('DATA_BL2')] p13: tolerance=1.5 checknetsindiffpair=FALSE checkdiffpairvsdiffpair=TRUE checkxsignals=TRUE checkothers=TRUE
MatchedLengths MatchedLengths_DATA_BL1 [InxSignalClass('DATA_BL1')] p14: tolerance=1.5 checknetsindiffpair=FALSE checkdiffpairvsdiffpair=TRUE checkxsignals=TRUE checkothers=TRUE
MatchedLengths MatchedLengths_DATA_BL0 [InxSignalClass('DATA_BL0')] p15: tolerance=1.5 checknetsindiffpair=FALSE checkdiffpairvsdiffpair=TRUE checkxsignals=TRUE checkothers=TRUE
MatchedLengths MatchedLengths_ADDR_PP2 [InxSignalClass('ADDR_PP2')] p16: tolerance=1.2 checknetsindiffpair=FALSE checkdiffpairvsdiffpair=TRUE checkxsignals=TRUE checkothers=TRUE
MatchedLengths MatchedLengths_ADDR_PP2_1 [InxSignalClass('ADDR_PP1')] p17: tolerance=1.2 checknetsindiffpair=FALSE checkdiffpairvsdiffpair=TRUE checkxsignals=TRUE checkothers=TRUE
MatchedLengths MatchedLengths_MGT [InxSignalClass('MGT')] p18: tolerance=1 checknetsindiffpair=TRUE checkdiffpairvsdiffpair=FALSE checkxsignals=FALSE checkothers=FALSE
MatchedLengths MatchedLengths_SFP [InxSignalClass('MGT')] p19: tolerance=1 checknetsindiffpair=TRUE checkdiffpairvsdiffpair=FALSE checkxsignals=FALSE checkothers=FALSE
MatchedLengths MatchedLengths_diff_clocks [InxSignalClass('Differential clocks')] p20: tolerance=1 checknetsindiffpair=TRUE checkdiffpairvsdiffpair=FALSE checkxsignals=FALSE checkothers=FALSE
MatchedLengths MatchLengths_xSignals_clock_fanout [InxSignalClass('Clock fanout')] p21: tolerance=1 checknetsindiffpair=FALSE checkdiffpairvsdiffpair=TRUE checkxsignals=TRUE checkothers=TRUE
MatchedLengths [InNet('slot*')] p22 off: tolerance=1 checknetsindiffpair=TRUE checkdiffpairvsdiffpair=FALSE checkxsignals=FALSE checkothers=FALSE
MinimumAnnularRing MinimumAnnularRing_mid [OnLayer('MidLayer1') or OnLayer('MidLayer2') or OnLayer('MidLayer3') or OnLayer('MidLayer4')] p1: minimumring=0.15
MinimumAnnularRing MinimumAnnularRing_outer [OnLayer('TopLayer') or OnLayer('BottomLayer')] p2: minimumring=0.1
MinimumSolderMaskSliver [All] p1: minsoldermaskwidth=0.075
ParallelSegment [All] p1 off: limit=5 gap=0.254
PlaneClearance PlaneClearance_MGT [InNetClass('MGT')] p1: clearance=0.25
PlaneClearance PlaneClearance_DDR [InNetClass('SE40') or InNetClass('D80')] p2: clearance=0.2
PlaneClearance [All] p3: clearance=0.15
PlaneConnect PlaneConnect_direct [HasFootprint('AMPHENOL_10052825-101LF') or HasFootprint('AMPHENOL_10052837-101LF') or HasFootprint('AMPHENOL_10052824-101LF') or HasFootprint('AMPHENOL_10052838-101LF') or HasFootprint('AMPHENOL_UE78B212700321')] p1: planeconnectstyle=Direct reliefexpansion=0.508 reliefentries=4 reliefconductorwidth=0.254 reliefairgap=0.254
PlaneConnect [All] p2: pad.planeconnectstyle=Relief pad.reliefexpansion=0.2 pad.reliefentries=4 pad.reliefconductorwidth=0.254 pad.reliefairgap=0.254 via.planeconnectstyle=Direct via.reliefexpansion=0.2 via.reliefentries=4 via.reliefconductorwidth=0.254 via.reliefairgap=0.15
PolygonConnect PolygonConnect_strip [InNet('STRIP3')] p1: connectstyle=Direct reliefconductorwidth=0.254 reliefentries=4 polygonreliefangle="90 Angle" airgapwidth=0.254
PolygonConnect PolygonConnect_direct [HasFootprint('AMPHENOL_10052825-101LF')  OR HasFootprint('AMPHENOL_10052837-101LF')] p2: connectstyle=Direct reliefconductorwidth=0.254 reliefentries=4 polygonreliefangle="90 Angle" airgapwidth=0.254
PolygonConnect PolygonConnect_PWR [InNetClass('PWR')] p3: thpad.connectstyle=Relief thpad.reliefconductorwidth=0.4 thpad.reliefentries=4 thpad.polygonreliefangle="90 Angle" thpad.airgapwidth=0.254 smdpad.connectstyle=Direct smdpad.reliefconductorwidth=0.254 smdpad.reliefentries=4 smdpad.polygonreliefangle="90 Angle" smdpad.airgapwidth=0.254 via.connectstyle=Direct via.reliefconductorwidth=0.254 via.reliefentries=4 via.polygonreliefangle="90 Angle" via.airgapwidth=0.254
PolygonConnect [All] p4: thpad.connectstyle=Relief thpad.reliefconductorwidth=0.254 thpad.reliefentries=4 thpad.polygonreliefangle="90 Angle" thpad.airgapwidth=0.254 smdpad.connectstyle=Relief smdpad.reliefconductorwidth=0.254 smdpad.reliefentries=4 smdpad.polygonreliefangle="90 Angle" smdpad.airgapwidth=0.254 via.connectstyle=Direct via.reliefconductorwidth=0.254 via.reliefentries=4 via.polygonreliefangle="90 Angle" via.airgapwidth=0.254
RoomDefinition Artix [InComponentClass('Artix')] p1 off: confinementstyle=ConfineIn formatcopy=TRUE lockcomponents=FALSE outline 161.061,24.95 126.361,24.95 126.361,63.95 161.061,63.95
RoomDefinition Overlapping [InComponentClass('Overlapping')] p2: confinementstyle=ConfineIn formatcopy=TRUE lockcomponents=FALSE outline -104.739,-157.95 -53.939,-157.95 -53.939,-132.55 -104.739,-132.55
RoomDefinition FPGA_JTAG [InComponentClass('FPGA_JTAG')] p3 off: confinementstyle=ConfineIn formatcopy=TRUE lockcomponents=FALSE outline 58.508,67.638 58.508,75.296 61.205,75.296 61.205,75.972 65.321,75.972 65.321,77.092 66.879,77.092 66.879,75.296 75.866,75.296 75.866,67.638
RoutingLayers RoutingLayers_1 [InNetClass('Diff_100Ohm')] p1 off: top layer_v5=TRUE mid layer 2_v5=TRUE mid layer 3_v5=TRUE mid layer 4_v5=TRUE mid layer 7_v5=TRUE bottom layer_v5=TRUE
RoutingLayers [All] p2 off: top layer_v5=TRUE mid layer 2_v5=TRUE mid layer 3_v5=TRUE mid layer 4_v5=TRUE mid layer 7_v5=TRUE bottom layer_v5=TRUE
RoutingTopology RoutingTopology_DDRAddressAndControls [InNetClass('DDR_AddressAndControls')] p1: topology=Daisy_Simple
RoutingTopology [All] p2: topology=Shortest
RoutingVias [All] p1: holewidth=0.2 width=0.4 viastyle="Through Hole" minholewidth=0.2 minwidth=0.4 maxholewidth=0.6 maxwidth=0.8
SMDEntry [All] p1 off: side=TRUE corner=TRUE anyangle=FALSE
SilkToSilkClearance [All] p1: silktosilkclearance=0.1
SilkToSolderMaskClearance SilkscreenOverComponentPads [IsPad] p1: minsilkscreentomaskgap=0.15 clearancetoexposedcopper=FALSE
SolderMaskExpansion SolderMaskExpansion_via [IsVia] p1: expansion=0.102 istentingtop=TRUE
SolderMaskExpansion [All] p2: expansion=0.05 istentingtop=FALSE
StubLength [All] p1 off: limit=3
SupplyNets "Schematic Supply Nets_28" [InNet('CHASSIS')] p1: voltage=0.000
SupplyNets "Schematic Supply Nets_16" [InNet('P3V3')] p2: voltage=0.000
SupplyNets "Schematic Supply Nets_27" [InNet('MGTAVCC')] p3: voltage=0.000
SupplyNets "Schematic Supply Nets_26" [InNet('MGTAVTT_G11')] p4: voltage=0.000
SupplyNets "Schematic Supply Nets_25" [InNet('MGTAVTT_G10')] p5: voltage=0.000
SupplyNets "Schematic Supply Nets_24" [InNet('P12V0')] p6: voltage=0.000
SupplyNets "Schematic Supply Nets_22" [InNet('MGTAVCC_G10')] p7: voltage=0.000
SupplyNets "Schematic Supply Nets_21" [InNet('P5V0_MP')] p8: voltage=0.000
SupplyNets "Schematic Supply Nets_20" [InNet('P2V5_LDO')] p9: voltage=0.000
SupplyNets "Schematic Supply Nets_19" [InNet('P1V5')] p10: voltage=0.000
SupplyNets "Schematic Supply Nets_18" [InNet('VCCAUX')] p11: voltage=0.000
SupplyNets "Schematic Supply Nets_17" [InNet('P3V3_LDO2')] p12: voltage=0.000
SupplyNets "Schematic Supply Nets_15" [InNet('P5V0_CLKa')] p13: voltage=0.000
SupplyNets "Schematic Supply Nets_14" [InNet('MGTAVCC_G11')] p14: voltage=0.000
SupplyNets "Schematic Supply Nets_13" [InNet('P1V2')] p15: voltage=0.000
SupplyNets "Schematic Supply Nets_12" [InNet('P1V0')] p16: voltage=0.000
SupplyNets "Schematic Supply Nets_11" [InNet('P3V3_MP')] p17: voltage=0.000
SupplyNets "Schematic Supply Nets_10" [InNet('VREF_DDR3')] p18: voltage=0.000
SupplyNets "Schematic Supply Nets_9" [InNet('GND')] p19: voltage=0.000
SupplyNets "Schematic Supply Nets_8" [InNet('VTT_DDR3')] p20: voltage=0.000
SupplyNets "Schematic Supply Nets_7" [InNet('P3V3_USB')] p21: voltage=0.000
SupplyNets "Schematic Supply Nets_6" [InNet('P3V3_ADCLK')] p22: voltage=0.000
SupplyNets "Schematic Supply Nets_5" [InNet('P1V8')] p23: voltage=0.000
SupplyNets "Schematic Supply Nets_4" [InNet('P3V3_LDO1')] p24: voltage=0.000
SupplyNets "Schematic Supply Nets_3" [InNet('P2V5')] p25: voltage=0.000
SupplyNets "Schematic Supply Nets_2" [InNet('VCCBRAM')] p26: voltage=0.000
SupplyNets "Schematic Supply Nets_1" [InNet('P1V8_USB')] p27: voltage=0.000
SupplyNets "Schematic Supply Nets" [InNet('P5V0_CLK')] p28: voltage=0.000
UnConnectedPin [All] p1 off:
UnRoutedNet [Not InPolygonClass('Copper_balancing')] p1: checkbadconnections=TRUE
ViasUnderSMD ViasUnderSMD_1 [(InNet('GND') AND (InComponent('IC1') or InComponent('IC2') or InComponent('IC3') or InComponent('IC14') or InComponent('IC15') or InComponent('IC18') or InComponent('IC6') or InComponent('IC7') or InComponent('IC9') or InComponent('IC10') or InComponent('IC11') or InComponent('IC27') or HasFootprint('MPS_MPM54304GMN') or HasFootprint('QFN50P700X700X90-45N-S295') or HasFootprint('MOLEX_MINI-SAS_VERTICAL_75784-0126')))] p1: allowed=TRUE
ViasUnderSMD [All] p2: allowed=FALSE
Width Width_DDR [InNetClass('SE40')] p1: maxlimit=0.22 minlimit=0.15 preferedwidth=0.16 toplayer_minwidth=0.22 toplayer_prefwidth=0.22 midlayer2_maxwidth=0.15 midlayer2_prefwidth=0.15 midlayer3_minwidth=0.16 midlayer3_maxwidth=0.16 midlayer4_minwidth=0.16 midlayer4_maxwidth=0.16 midlayer7_maxwidth=0.15 midlayer7_prefwidth=0.15 bottomlayer_minwidth=0.22 bottomlayer_prefwidth=0.22 impedanceprofiledriven=TRUE impedanceprofileid={2D202CA9-0084-4AC3-B5C3-64950548ABB7} impedanceprofilevalue=40.000000 minimp=50.000000 maximp=50.000000 favimp=50.000000
Width Width_50Ohm [InNetClass('50Ohm')] p2: maxlimit=0.254 minlimit=0.19 preferedwidth=0.254 toplayer_maxwidth=0.19 toplayer_prefwidth=0.19 midlayer2_minwidth=0.24 midlayer2_maxwidth=0.24 midlayer2_prefwidth=0.24 midlayer3_minwidth=0.254 midlayer4_minwidth=0.254 midlayer7_minwidth=0.24 midlayer7_maxwidth=0.24 midlayer7_prefwidth=0.24 bottomlayer_maxwidth=0.19 bottomlayer_prefwidth=0.19 minimp=50.000000 maximp=50.000000 favimp=50.000000
Width [All] p3: maxlimit=2 minlimit=0.075 preferedwidth=0.125
13 further rules are at their usual default settings.

## Classes and differential pairs
component class Kasli-DIOT: C161 C204 C228 C246 C247 D10 IC16 J6 J18 R13 R80 R94 R95 R96 R139 R154 R214 R301 TR1
net class PE_CLK: 1_PE_CLK_N 1_PE_CLK_P 2_PE_CLK_N 2_PE_CLK_P 3_PE_CLK_N 3_PE_CLK_P 4_PE_CLK_N 4_PE_CLK_P 5_PE_CLK_N 5_PE_CLK_P 6_PE_CLK_N 6_PE_CLK_P 7_PE_CLK_N 7_PE_CLK_P 8_PE_CLK_N 8_PE_CLK_P
net class D90: USB_D_IN_N USB_D_IN_P USB_D_R_N USB_D_R_P
net class FPGA_TP: FPGA_TP.FPGA_TESTPOINT0 FPGA_TP.FPGA_TESTPOINT1 FPGA_TP.FPGA_TESTPOINT2 FPGA_TP.FPGA_TESTPOINT3
net class DIOT_I2C: DIOT_I2C.SCL DIOT_I2C.SDA
net class DIOT_CLK_IN_0: DIOT_CLK_IN_0.CLK_N DIOT_CLK_IN_0.CLK_P
net class DIOT_BUS_CTRL: DIOT_BUS_CTRL.PRST_N DIOT_BUS_CTRL.PS_ON_N DIOT_BUS_CTRL.PWR_FAIL_N DIOT_BUS_CTRL.PWRBTN_N DIOT_BUS_CTRL.RST_N
component class U_Ect_conn: C423 C424 C425 F1 F3 F4 J5
net class PWR: CHASSIS MGTAVCC P1V0 P1V2 P1V5 P1V8 P2V5 P3V3 P5V0_CLK P12V0 VCCBRAM
differential pair class LVPECL: CK_FPGAIO CKOUT_1 CKOUT_D_1 CLK_OUT
net class BYTE4: DDR_DM3 DDR_DQ24 DDR_DQ25 DDR_DQ26 DDR_DQ27 DDR_DQ28 DDR_DQ29 DDR_DQ30 DDR_DQ31 DDR_DQS3_N DDR_DQS3_P
net class BYTE2: DDR_DM1 DDR_DQ8 DDR_DQ9 DDR_DQ10 DDR_DQ11 DDR_DQ12 DDR_DQ13 DDR_DQ14 DDR_DQ15 DDR_DQS1_N DDR_DQS1_P
net class MGT_CLK3: MGT_CLK3.CLK_N MGT_CLK3.CLK_P
net class MGT: MGT1_RxC_N MGT1_RxC_P MGT1_Tx_N MGT1_Tx_P MGT2_RxC_N MGT2_RxC_P MGT2_Tx_N MGT2_Tx_P MGT3_RxC_N MGT3_RxC_P MGT3_Tx_N MGT3_Tx_P MGT4_RxC_N MGT4_RxC_P MGT4_Tx_N MGT4_Tx_P MGT5_RxC_N MGT5_RxC_P MGT5_Tx_N MGT5_Tx_P MGT6_RxC_N MGT6_RxC_P MGT6_Tx_N MGT6_Tx_P MGT7_RxC_N MGT7_RxC_P MGT7_Tx_N MGT7_Tx_P MGT8_RxC_N MGT8_RxC_P MGT8_Tx_N MGT8_Tx_P MGT_CLK_ext_C_N MGT_CLK_ext_C_P MGT_CLK_ext_N MGT_CLK_ext_P S0_RX_N S0_RX_P S0_TX_N S0_TX_P S0C_RX_N S0C_RX_P S0C_TX_N S0C_TX_P S1_RX_N S1_RX_P S1_TX_N S1_TX_P S1C_RX_N S1C_RX_P S1C_TX_N S1C_TX_P S2_RX_N S2_RX_P S2_TX_N S2_TX_P S2C_RX_N S2C_RX_P S2C_TX_N S2C_TX_P S3_RX_N S3_RX_P S3_TX_N S3_TX_P S3C_RX_N S3C_RX_P S3C_TX_N S3C_TX_P SFP_RX_TX_0.RD_N SFP_RX_TX_0.RD_P SFP_RX_TX_0.TD_N SFP_RX_TX_0.TD_P SFP_RX_TX_1.RD_N SFP_RX_TX_1.RD_P SFP_RX_TX_1.TD_N SFP_RX_TX_1.TD_P SFP_RX_TX_2.RD_N SFP_RX_TX_2.RD_P SFP_RX_TX_2.TD_N SFP_RX_TX_2.TD_P SFP_RX_TX_3.RD_N SFP_RX_TX_3.RD_P SFP_RX_TX_3.TD_N SFP_RX_TX_3.TD_P SLOT1_MGT.MGT_Rx_N SLOT1_MGT.MGT_Rx_P SLOT1_MGT.MGT_Tx_N SLOT1_MGT.MGT_Tx_P SLOT2_MGT.MGT_Rx_N SLOT2_MGT.MGT_Rx_P SLOT2_MGT.MGT_Tx_N SLOT2_MGT.MGT_Tx_P SLOT3_MGT.MGT_Rx_N SLOT3_MGT.MGT_Rx_P SLOT3_MGT.MGT_Tx_N SLOT3_MGT.MGT_Tx_P SLOT4_MGT.MGT_Rx_N SLOT4_MGT.MGT_Rx_P SLOT4_MGT.MGT_Tx_N SLOT4_MGT.MGT_Tx_P SLOT5_MGT.MGT_Rx_N SLOT5_MGT.MGT_Rx_P SLOT5_MGT.MGT_Tx_N SLOT5_MGT.MGT_Tx_P SLOT6_MGT.MGT_Rx_N SLOT6_MGT.MGT_Rx_P SLOT6_MGT.MGT_Tx_N SLOT6_MGT.MGT_Tx_P SLOT7_MGT.MGT_Rx_N SLOT7_MGT.MGT_Rx_P SLOT7_MGT.MGT_Tx_N SLOT7_MGT.MGT_Tx_P SLOT8_MGT.MGT_Rx_N SLOT8_MGT.MGT_Rx_P SLOT8_MGT.MGT_Tx_N SLOT8_MGT.MGT_Tx_P
net class D100: 1_PE_CLK_N 1_PE_CLK_P 2_PE_CLK_N 2_PE_CLK_P 3_PE_CLK_N 3_PE_CLK_P 4_PE_CLK_N 4_PE_CLK_P 5_PE_CLK_N 5_PE_CLK_P 6_PE_CLK_N 6_PE_CLK_P 7_PE_CLK_N 7_PE_CLK_P 8_PE_CLK_N 8_PE_CLK_P CK_GTP_125_N CK_GTP_125_P CK_GTP_N CK_GTP_P CKC_GTP_125_N CKC_GTP_125_P MGT1_RxC_N MGT1_RxC_P MGT1_Tx_N MGT1_Tx_P MGT2_RxC_N MGT2_RxC_P MGT2_Tx_N MGT2_Tx_P MGT3_RxC_N MGT3_RxC_P MGT3_Tx_N MGT3_Tx_P MGT4_RxC_N MGT4_RxC_P MGT4_Tx_N MGT4_Tx_P MGT5_RxC_N MGT5_RxC_P MGT5_Tx_N MGT5_Tx_P MGT6_RxC_N MGT6_RxC_P MGT6_Tx_N MGT6_Tx_P MGT7_RxC_N MGT7_RxC_P MGT7_Tx_N MGT7_Tx_P MGT8_RxC_N MGT8_RxC_P MGT8_Tx_N MGT8_Tx_P MGT_CLK_ext_C_N MGT_CLK_ext_C_P MGT_CLK_ext_N MGT_CLK_ext_P S0_RX_N S0_RX_P S0_TX_N S0_TX_P S0C_RX_N S0C_RX_P S0C_TX_N S0C_TX_P S1_RX_N S1_RX_P S1_TX_N S1_TX_P S1C_RX_N S1C_RX_P S1C_TX_N S1C_TX_P S2_RX_N S2_RX_P S2_TX_N S2_TX_P S2C_RX_N S2C_RX_P S2C_TX_N S2C_TX_P S3_RX_N S3_RX_P S3_TX_N S3_TX_P S3C_RX_N S3C_RX_P S3C_TX_N S3C_TX_P SFP_RX_TX_0.RD_N SFP_RX_TX_0.RD_P SFP_RX_TX_0.TD_N SFP_RX_TX_0.TD_P SFP_RX_TX_1.RD_N SFP_RX_TX_1.RD_P SFP_RX_TX_1.TD_N SFP_RX_TX_1.TD_P SFP_RX_TX_2.RD_N SFP_RX_TX_2.RD_P SFP_RX_TX_2.TD_N SFP_RX_TX_2.TD_P SFP_RX_TX_3.RD_N SFP_RX_TX_3.RD_P SFP_RX_TX_3.TD_N SFP_RX_TX_3.TD_P SLOT1.LVDS_0_N SLOT1.LVDS_0_P SLOT1.LVDS_1_N SLOT1.LVDS_1_P SLOT1.LVDS_2_N SLOT1.LVDS_2_P SLOT1.LVDS_3_N SLOT1.LVDS_3_P SLOT1.LVDS_4_N SLOT1.LVDS_4_P SLOT1.LVDS_5_N SLOT1.LVDS_5_P SLOT1.LVDS_6_N SLOT1.LVDS_6_P SLOT1.LVDS_7_N SLOT1.LVDS_7_P SLOT1.LVDS_8_N SLOT1.LVDS_8_P SLOT1.LVDS_9_N SLOT1.LVDS_9_P SLOT1.LVDS_10_N SLOT1.LVDS_10_P SLOT1.LVDS_11_N SLOT1.LVDS_11_P SLOT1.LVDS_12_N SLOT1.LVDS_12_P SLOT1.LVDS_13_N SLOT1.LVDS_13_P SLOT1.LVDS_14_N SLOT1.LVDS_14_P SLOT1.LVDS_15_N SLOT1.LVDS_15_P SLOT1_MGT.MGT_Rx_N SLOT1_MGT.MGT_Rx_P SLOT1_MGT.MGT_Tx_N SLOT1_MGT.MGT_Tx_P SLOT2.LVDS_0_N SLOT2.LVDS_0_P SLOT2.LVDS_1_N SLOT2.LVDS_1_P SLOT2.LVDS_2_N SLOT2.LVDS_2_P SLOT2.LVDS_3_N SLOT2.LVDS_3_P SLOT2.LVDS_4_N SLOT2.LVDS_4_P SLOT2.LVDS_5_N SLOT2.LVDS_5_P SLOT2.LVDS_6_N SLOT2.LVDS_6_P SLOT2.LVDS_7_N SLOT2.LVDS_7_P SLOT2.LVDS_8_N SLOT2.LVDS_8_P SLOT2.LVDS_9_N SLOT2.LVDS_9_P SLOT2.LVDS_10_N SLOT2.LVDS_10_P SLOT2.LVDS_11_N SLOT2.LVDS_11_P SLOT2.LVDS_12_N SLOT2.LVDS_12_P SLOT2.LVDS_13_N SLOT2.LVDS_13_P SLOT2.LVDS_14_N SLOT2.LVDS_14_P SLOT2.LVDS_15_N SLOT2.LVDS_15_P SLOT2_MGT.MGT_Rx_N SLOT2_MGT.MGT_Rx_P SLOT2_MGT.MGT_Tx_N SLOT2_MGT.MGT_Tx_P SLOT3.LVDS_0_N SLOT3.LVDS_0_P SLOT3.LVDS_1_N SLOT3.LVDS_1_P SLOT3.LVDS_2_N SLOT3.LVDS_2_P SLOT3.LVDS_3_N SLOT3.LVDS_3_P SLOT3.LVDS_4_N SLOT3.LVDS_4_P SLOT3.LVDS_5_N SLOT3.LVDS_5_P SLOT3.LVDS_6_N SLOT3.LVDS_6_P SLOT3.LVDS_7_N SLOT3.LVDS_7_P SLOT3.LVDS_8_N SLOT3.LVDS_8_P SLOT3.LVDS_9_N SLOT3.LVDS_9_P SLOT3.LVDS_10_N SLOT3.LVDS_10_P SLOT3.LVDS_11_N SLOT3.LVDS_11_P SLOT3.LVDS_12_N SLOT3.LVDS_12_P SLOT3.LVDS_13_N SLOT3.LVDS_13_P SLOT3.LVDS_14_N SLOT3.LVDS_14_P SLOT3.LVDS_15_N SLOT3.LVDS_15_P SLOT3_MGT.MGT_Rx_N SLOT3_MGT.MGT_Rx_P SLOT3_MGT.MGT_Tx_N SLOT3_MGT.MGT_Tx_P SLOT4.LVDS_0_N SLOT4.LVDS_0_P SLOT4.LVDS_1_N SLOT4.LVDS_1_P SLOT4.LVDS_2_N SLOT4.LVDS_2_P SLOT4.LVDS_3_N SLOT4.LVDS_3_P SLOT4.LVDS_4_N SLOT4.LVDS_4_P SLOT4.LVDS_5_N SLOT4.LVDS_5_P SLOT4.LVDS_6_N SLOT4.LVDS_6_P SLOT4.LVDS_7_N SLOT4.LVDS_7_P SLOT4.LVDS_8_N SLOT4.LVDS_8_P SLOT4.LVDS_9_N SLOT4.LVDS_9_P SLOT4.LVDS_10_N SLOT4.LVDS_10_P SLOT4.LVDS_11_N SLOT4.LVDS_11_P SLOT4.LVDS_12_N SLOT4.LVDS_12_P SLOT4.LVDS_13_N SLOT4.LVDS_13_P SLOT4.LVDS_14_N SLOT4.LVDS_14_P SLOT4.LVDS_15_N SLOT4.LVDS_15_P SLOT4_MGT.MGT_Rx_N SLOT4_MGT.MGT_Rx_P SLOT4_MGT.MGT_Tx_N SLOT4_MGT.MGT_Tx_P SLOT5.LVDS_0_N SLOT5.LVDS_0_P SLOT5.LVDS_1_N SLOT5.LVDS_1_P SLOT5.LVDS_2_N SLOT5.LVDS_2_P SLOT5.LVDS_3_N SLOT5.LVDS_3_P SLOT5.LVDS_4_N SLOT5.LVDS_4_P SLOT5.LVDS_5_N SLOT5.LVDS_5_P SLOT5.LVDS_6_N SLOT5.LVDS_6_P SLOT5.LVDS_7_N SLOT5.LVDS_7_P SLOT5.LVDS_8_N SLOT5.LVDS_8_P SLOT5.LVDS_9_N SLOT5.LVDS_9_P SLOT5.LVDS_10_N SLOT5.LVDS_10_P SLOT5.LVDS_11_N SLOT5.LVDS_11_P SLOT5.LVDS_12_N SLOT5.LVDS_12_P SLOT5.LVDS_13_N SLOT5.LVDS_13_P SLOT5.LVDS_14_N SLOT5.LVDS_14_P SLOT5.LVDS_15_N SLOT5.LVDS_15_P SLOT5_MGT.MGT_Rx_N SLOT5_MGT.MGT_Rx_P SLOT5_MGT.MGT_Tx_N SLOT5_MGT.MGT_Tx_P SLOT6.LVDS_0_N SLOT6.LVDS_0_P SLOT6.LVDS_1_N SLOT6.LVDS_1_P SLOT6.LVDS_2_N SLOT6.LVDS_2_P SLOT6.LVDS_3_N SLOT6.LVDS_3_P SLOT6.LVDS_4_N SLOT6.LVDS_4_P SLOT6.LVDS_5_N SLOT6.LVDS_5_P SLOT6.LVDS_6_N SLOT6.LVDS_6_P SLOT6.LVDS_7_N SLOT6.LVDS_7_P SLOT6.LVDS_8_N SLOT6.LVDS_8_P SLOT6.LVDS_9_N SLOT6.LVDS_9_P SLOT6.LVDS_10_N SLOT6.LVDS_10_P SLOT6.LVDS_11_N SLOT6.LVDS_11_P SLOT6.LVDS_12_N SLOT6.LVDS_12_P SLOT6.LVDS_13_N SLOT6.LVDS_13_P SLOT6.LVDS_14_N SLOT6.LVDS_14_P SLOT6.LVDS_15_N SLOT6.LVDS_15_P SLOT6_MGT.MGT_Rx_N SLOT6_MGT.MGT_Rx_P SLOT6_MGT.MGT_Tx_N SLOT6_MGT.MGT_Tx_P SLOT7.LVDS_0_N SLOT7.LVDS_0_P SLOT7.LVDS_1_N SLOT7.LVDS_1_P SLOT7.LVDS_2_N SLOT7.LVDS_2_P SLOT7.LVDS_3_N SLOT7.LVDS_3_P SLOT7.LVDS_4_N SLOT7.LVDS_4_P SLOT7.LVDS_5_N SLOT7.LVDS_5_P SLOT7.LVDS_6_N SLOT7.LVDS_6_P SLOT7.LVDS_7_N SLOT7.LVDS_7_P SLOT7.LVDS_8_N SLOT7.LVDS_8_P SLOT7.LVDS_9_N SLOT7.LVDS_9_P SLOT7.LVDS_10_N SLOT7.LVDS_10_P SLOT7.LVDS_11_N SLOT7.LVDS_11_P SLOT7.LVDS_12_N SLOT7.LVDS_12_P SLOT7.LVDS_13_N SLOT7.LVDS_13_P SLOT7.LVDS_14_N SLOT7.LVDS_14_P SLOT7.LVDS_15_N SLOT7.LVDS_15_P SLOT7_MGT.MGT_Rx_N SLOT7_MGT.MGT_Rx_P SLOT7_MGT.MGT_Tx_N SLOT7_MGT.MGT_Tx_P SLOT8.LVDS_0_N SLOT8.LVDS_0_P SLOT8.LVDS_1_N SLOT8.LVDS_1_P SLOT8.LVDS_2_N SLOT8.LVDS_2_P SLOT8.LVDS_3_N SLOT8.LVDS_3_P SLOT8.LVDS_4_N SLOT8.LVDS_4_P SLOT8.LVDS_5_N SLOT8.LVDS_5_P SLOT8.LVDS_6_N SLOT8.LVDS_6_P SLOT8.LVDS_7_N SLOT8.LVDS_7_P SLOT8.LVDS_8_N SLOT8.LVDS_8_P SLOT8.LVDS_9_N SLOT8.LVDS_9_P SLOT8.LVDS_10_N SLOT8.LVDS_10_P SLOT8.LVDS_11_N SLOT8.LVDS_11_P SLOT8.LVDS_12_N SLOT8.LVDS_12_P SLOT8.LVDS_13_N SLOT8.LVDS_13_P SLOT8.LVDS_14_N SLOT8.LVDS_14_P SLOT8.LVDS_15_N SLOT8.LVDS_15_P SLOT8_MGT.MGT_Rx_N SLOT8_MGT.MGT_Rx_P SLOT8_MGT.MGT_Tx_N SLOT8_MGT.MGT_Tx_P
net class MGT_CLK2: MGT_CLK2.CLK_N MGT_CLK2.CLK_P
net class MGT_CLK1: MGT_CLK1.CLK_N MGT_CLK1.CLK_P
net class SLOT8: SLOT8.LVDS_0_N SLOT8.LVDS_0_P SLOT8.LVDS_1_N SLOT8.LVDS_1_P SLOT8.LVDS_2_N SLOT8.LVDS_2_P SLOT8.LVDS_3_N SLOT8.LVDS_3_P SLOT8.LVDS_4_N SLOT8.LVDS_4_P SLOT8.LVDS_5_N SLOT8.LVDS_5_P SLOT8.LVDS_6_N SLOT8.LVDS_6_P SLOT8.LVDS_7_N SLOT8.LVDS_7_P SLOT8.LVDS_8_N SLOT8.LVDS_8_P SLOT8.LVDS_9_N SLOT8.LVDS_9_P SLOT8.LVDS_10_N SLOT8.LVDS_10_P SLOT8.LVDS_11_N SLOT8.LVDS_11_P SLOT8.LVDS_12_N SLOT8.LVDS_12_P SLOT8.LVDS_13_N SLOT8.LVDS_13_P SLOT8.LVDS_14_N SLOT8.LVDS_14_P SLOT8.LVDS_15_N SLOT8.LVDS_15_P
net class SLOT8_MGT: SLOT8_MGT.MGT_Rx_N SLOT8_MGT.MGT_Rx_P SLOT8_MGT.MGT_Tx_N SLOT8_MGT.MGT_Tx_P
net class SLOT7: SLOT7.LVDS_0_N SLOT7.LVDS_0_P SLOT7.LVDS_1_N SLOT7.LVDS_1_P SLOT7.LVDS_2_N SLOT7.LVDS_2_P SLOT7.LVDS_3_N SLOT7.LVDS_3_P SLOT7.LVDS_4_N SLOT7.LVDS_4_P SLOT7.LVDS_5_N SLOT7.LVDS_5_P SLOT7.LVDS_6_N SLOT7.LVDS_6_P SLOT7.LVDS_7_N SLOT7.LVDS_7_P SLOT7.LVDS_8_N SLOT7.LVDS_8_P SLOT7.LVDS_9_N SLOT7.LVDS_9_P SLOT7.LVDS_10_N SLOT7.LVDS_10_P SLOT7.LVDS_11_N SLOT7.LVDS_11_P SLOT7.LVDS_12_N SLOT7.LVDS_12_P SLOT7.LVDS_13_N SLOT7.LVDS_13_P SLOT7.LVDS_14_N SLOT7.LVDS_14_P SLOT7.LVDS_15_N SLOT7.LVDS_15_P
net class SLOT7_MGT: SLOT7_MGT.MGT_Rx_N SLOT7_MGT.MGT_Rx_P SLOT7_MGT.MGT_Tx_N SLOT7_MGT.MGT_Tx_P
net class SLOT6: SLOT6.LVDS_0_N SLOT6.LVDS_0_P SLOT6.LVDS_1_N SLOT6.LVDS_1_P SLOT6.LVDS_2_N SLOT6.LVDS_2_P SLOT6.LVDS_3_N SLOT6.LVDS_3_P SLOT6.LVDS_4_N SLOT6.LVDS_4_P SLOT6.LVDS_5_N SLOT6.LVDS_5_P SLOT6.LVDS_6_N SLOT6.LVDS_6_P SLOT6.LVDS_7_N SLOT6.LVDS_7_P SLOT6.LVDS_8_N SLOT6.LVDS_8_P SLOT6.LVDS_9_N SLOT6.LVDS_9_P SLOT6.LVDS_10_N SLOT6.LVDS_10_P SLOT6.LVDS_11_N SLOT6.LVDS_11_P SLOT6.LVDS_12_N SLOT6.LVDS_12_P SLOT6.LVDS_13_N SLOT6.LVDS_13_P SLOT6.LVDS_14_N SLOT6.LVDS_14_P SLOT6.LVDS_15_N SLOT6.LVDS_15_P
net class SLOT6_MGT: SLOT6_MGT.MGT_Rx_N SLOT6_MGT.MGT_Rx_P SLOT6_MGT.MGT_Tx_N SLOT6_MGT.MGT_Tx_P
net class SLOT5: SLOT5.LVDS_0_N SLOT5.LVDS_0_P SLOT5.LVDS_1_N SLOT5.LVDS_1_P SLOT5.LVDS_2_N SLOT5.LVDS_2_P SLOT5.LVDS_3_N SLOT5.LVDS_3_P SLOT5.LVDS_4_N SLOT5.LVDS_4_P SLOT5.LVDS_5_N SLOT5.LVDS_5_P SLOT5.LVDS_6_N SLOT5.LVDS_6_P SLOT5.LVDS_7_N SLOT5.LVDS_7_P SLOT5.LVDS_8_N SLOT5.LVDS_8_P SLOT5.LVDS_9_N SLOT5.LVDS_9_P SLOT5.LVDS_10_N SLOT5.LVDS_10_P SLOT5.LVDS_11_N SLOT5.LVDS_11_P SLOT5.LVDS_12_N SLOT5.LVDS_12_P SLOT5.LVDS_13_N SLOT5.LVDS_13_P SLOT5.LVDS_14_N SLOT5.LVDS_14_P SLOT5.LVDS_15_N SLOT5.LVDS_15_P
net class SLOT5_MGT: SLOT5_MGT.MGT_Rx_N SLOT5_MGT.MGT_Rx_P SLOT5_MGT.MGT_Tx_N SLOT5_MGT.MGT_Tx_P
net class SLOT4: SLOT4.LVDS_0_N SLOT4.LVDS_0_P SLOT4.LVDS_1_N SLOT4.LVDS_1_P SLOT4.LVDS_2_N SLOT4.LVDS_2_P SLOT4.LVDS_3_N SLOT4.LVDS_3_P SLOT4.LVDS_4_N SLOT4.LVDS_4_P SLOT4.LVDS_5_N SLOT4.LVDS_5_P SLOT4.LVDS_6_N SLOT4.LVDS_6_P SLOT4.LVDS_7_N SLOT4.LVDS_7_P SLOT4.LVDS_8_N SLOT4.LVDS_8_P SLOT4.LVDS_9_N SLOT4.LVDS_9_P SLOT4.LVDS_10_N SLOT4.LVDS_10_P SLOT4.LVDS_11_N SLOT4.LVDS_11_P SLOT4.LVDS_12_N SLOT4.LVDS_12_P SLOT4.LVDS_13_N SLOT4.LVDS_13_P SLOT4.LVDS_14_N SLOT4.LVDS_14_P SLOT4.LVDS_15_N SLOT4.LVDS_15_P
net class SLOT4_MGT: SLOT4_MGT.MGT_Rx_N SLOT4_MGT.MGT_Rx_P SLOT4_MGT.MGT_Tx_N SLOT4_MGT.MGT_Tx_P
net class SLOT3: SLOT3.LVDS_0_N SLOT3.LVDS_0_P SLOT3.LVDS_1_N SLOT3.LVDS_1_P SLOT3.LVDS_2_N SLOT3.LVDS_2_P SLOT3.LVDS_3_N SLOT3.LVDS_3_P SLOT3.LVDS_4_N SLOT3.LVDS_4_P SLOT3.LVDS_5_N SLOT3.LVDS_5_P SLOT3.LVDS_6_N SLOT3.LVDS_6_P SLOT3.LVDS_7_N SLOT3.LVDS_7_P SLOT3.LVDS_8_N SLOT3.LVDS_8_P SLOT3.LVDS_9_N SLOT3.LVDS_9_P SLOT3.LVDS_10_N SLOT3.LVDS_10_P SLOT3.LVDS_11_N SLOT3.LVDS_11_P SLOT3.LVDS_12_N SLOT3.LVDS_12_P SLOT3.LVDS_13_N SLOT3.LVDS_13_P SLOT3.LVDS_14_N SLOT3.LVDS_14_P SLOT3.LVDS_15_N SLOT3.LVDS_15_P
net class SLOT3_MGT: SLOT3_MGT.MGT_Rx_N SLOT3_MGT.MGT_Rx_P SLOT3_MGT.MGT_Tx_N SLOT3_MGT.MGT_Tx_P
net class SLOT2: SLOT2.LVDS_0_N SLOT2.LVDS_0_P SLOT2.LVDS_1_N SLOT2.LVDS_1_P SLOT2.LVDS_2_N SLOT2.LVDS_2_P SLOT2.LVDS_3_N SLOT2.LVDS_3_P SLOT2.LVDS_4_N SLOT2.LVDS_4_P SLOT2.LVDS_5_N SLOT2.LVDS_5_P SLOT2.LVDS_6_N SLOT2.LVDS_6_P SLOT2.LVDS_7_N SLOT2.LVDS_7_P SLOT2.LVDS_8_N SLOT2.LVDS_8_P SLOT2.LVDS_9_N SLOT2.LVDS_9_P SLOT2.LVDS_10_N SLOT2.LVDS_10_P SLOT2.LVDS_11_N SLOT2.LVDS_11_P SLOT2.LVDS_12_N SLOT2.LVDS_12_P SLOT2.LVDS_13_N SLOT2.LVDS_13_P SLOT2.LVDS_14_N SLOT2.LVDS_14_P SLOT2.LVDS_15_N SLOT2.LVDS_15_P
net class SLOT2_MGT: SLOT2_MGT.MGT_Rx_N SLOT2_MGT.MGT_Rx_P SLOT2_MGT.MGT_Tx_N SLOT2_MGT.MGT_Tx_P
net class SLOT1: SLOT1.LVDS_0_N SLOT1.LVDS_0_P SLOT1.LVDS_1_N SLOT1.LVDS_1_P SLOT1.LVDS_2_N SLOT1.LVDS_2_P SLOT1.LVDS_3_N SLOT1.LVDS_3_P SLOT1.LVDS_4_N SLOT1.LVDS_4_P SLOT1.LVDS_5_N SLOT1.LVDS_5_P SLOT1.LVDS_6_N SLOT1.LVDS_6_P SLOT1.LVDS_7_N SLOT1.LVDS_7_P SLOT1.LVDS_8_N SLOT1.LVDS_8_P SLOT1.LVDS_9_N SLOT1.LVDS_9_P SLOT1.LVDS_10_N SLOT1.LVDS_10_P SLOT1.LVDS_11_N SLOT1.LVDS_11_P SLOT1.LVDS_12_N SLOT1.LVDS_12_P SLOT1.LVDS_13_N SLOT1.LVDS_13_P SLOT1.LVDS_14_N SLOT1.LVDS_14_P SLOT1.LVDS_15_N SLOT1.LVDS_15_P
net class SLOT1_MGT: SLOT1_MGT.MGT_Rx_N SLOT1_MGT.MGT_Rx_P SLOT1_MGT.MGT_Tx_N SLOT1_MGT.MGT_Tx_P
net class SHARED_BUS_[4..0]: SHARED_BUS_0 SHARED_BUS_1 SHARED_BUS_2 SHARED_BUS_3 SHARED_BUS_4
net class SERVMOD: SERVMOD.1_SERVMOD SERVMOD.2_SERVMOD SERVMOD.3_SERVMOD SERVMOD.4_SERVMOD SERVMOD.5_SERVMOD SERVMOD.6_SERVMOD SERVMOD.7_SERVMOD SERVMOD.8_SERVMOD
net class SE40: BYTE1 BYTE3 DDR_A00 DDR_A01 DDR_A02 DDR_A03 DDR_A04 DDR_A05 DDR_A06 DDR_A07 DDR_A08 DDR_A09 DDR_A10 DDR_A11 DDR_A12 DDR_A13 DDR_A14 DDR_BA0 DDR_BA1 DDR_BA2 DDR_CAS_N DDR_CKE DDR_CS_N DDR_DM0 DDR_DM1 DDR_DM2 DDR_DM3 DDR_DQ0 DDR_DQ1 DDR_DQ2 DDR_DQ3 DDR_DQ4 DDR_DQ5 DDR_DQ6 DDR_DQ7 DDR_DQ8 DDR_DQ9 DDR_DQ10 DDR_DQ11 DDR_DQ12 DDR_DQ13 DDR_DQ14 DDR_DQ15 DDR_DQ16 DDR_DQ17 DDR_DQ18 DDR_DQ19 DDR_DQ20 DDR_DQ21 DDR_DQ22 DDR_DQ23 DDR_DQ24 DDR_DQ25 DDR_DQ26 DDR_DQ27 DDR_DQ28 DDR_DQ29 DDR_DQ30 DDR_DQ31 DDR_ODT DDR_RAS_N DDR_WE_N
net class POWER: MGTAVCC_G10 MGTAVCC_G11 MGTAVTT_G10 MGTAVTT_G11 VCCAUX VCCBRAM
net class MON-bus: MON-bus.F_IO0 MON-bus.F_IO1 MON-bus.F_RST MON-bus.M_SCL MON-bus.M_SDA MON-bus.P_IO0 MON-bus.P_IO1 MON-bus.P_IO2 MON-bus.P_PRES0_N MON-bus.P_PRES1_N MON-bus.P_RST
net class ESD_STRIP: CHASSIS STRIP1 STRIP2
net class BYTE3: BYTE3 DDR_DM2 DDR_DQ16 DDR_DQ17 DDR_DQ18 DDR_DQ19 DDR_DQ20 DDR_DQ21 DDR_DQ22 DDR_DQ23 DDR_DQS2_N DDR_DQS2_P
net class BYTE1: DDR_DM0 DDR_DQ0 DDR_DQ1 DDR_DQ2 DDR_DQ3 DDR_DQ4 DDR_DQ5 DDR_DQ6 DDR_DQ7 DDR_DQS0_N DDR_DQS0_P
net class D80: DDR_A01 DDR_CK_N DDR_CK_P DDR_DQS0_N DDR_DQS0_P DDR_DQS1_N DDR_DQS1_P DDR_DQS2_N DDR_DQS2_P DDR_DQS3_N DDR_DQS3_P
net class ADDR/CMD: DDR_A00 DDR_A01 DDR_A02 DDR_A03 DDR_A04 DDR_A05 DDR_A06 DDR_A07 DDR_A08 DDR_A09 DDR_A10 DDR_A11 DDR_A12 DDR_A13 DDR_A14 DDR_BA0 DDR_BA1 DDR_BA2 DDR_CAS_N DDR_CKE DDR_CS_N DDR_ODT DDR_RAS_N DDR_WE_N
component class U_DIOT_connectors_P4_P5_P6: C73 C74 C142 C229 C230 C231 C232 C233 C258 C434 C435 C436 C437 C438 C439 C440 C441 C442 C443 C444 C445 C446 C447 C448 D1 D4 J11 J12 J31
component class Overlapping: J11 J14
component class U_Bank_16_32_36: C397 C398 R73 R75 R76 R77 R78 R79 R81 R83 R84 R85 R92 R93 R146 R239 R249 R257 R258 R259 R260 R261 R274 R275 R290 R291 R292 T5 T23 T24
component class CLK_buffer_DRTIO_CDR: C399 C400 C404 C406 C407 C408 IC33 L9 R155 R273
polygon class Copper_balancing: Copper_balancing
net class SFP_RX_TX_3: SFP_RX_TX_3.RD_N SFP_RX_TX_3.RD_P SFP_RX_TX_3.TD_N SFP_RX_TX_3.TD_P
net class SFP_3: SFP_3.LED SFP_3.LOS SFP_3.MOD_PRESENT SFP_3.RATE_SELECT SFP_3.RATE_SELECT1 SFP_3.SCL SFP_3.SDA SFP_3.TX_DISABLE SFP_3.TX_FAULT
net class GPIO_INT[1..0]: GPIO_INT0 GPIO_INT1
component class U_SFP: C160 C178 C179 C180 C181 C182 C183 C184 C185 C244 C259 C260 C261 C262 C263 C264 C265 C266 C267 C268 C269 C270 C271 C272 C273 C274 C275 C276 C277 C280 C281 C412 DS1 DS2 DS3 J19 L19 L20 L21 L30 L31 L32 L33 L34 LD11 LD15 LD16 LD17 Plate1 Plate2 Plate3 Plate4 R130 R133 R134 R135 R136 R137 R138 R140 R141 R142 R143 R144 R145 R174 R193 R213 R215 R216 R217 R218 R219 R220 R222 R223 T11 T16 T17 T18
net class 50Ohm: CLK_OUT_CON_P EEM_CLK_OUT0 EEM_CLK_OUT1 NetC20_2 NetC21_2 NetC228_2
component class FPGA_JTAG: C159 R58
component class Artix: C51 C61 C69 C81 C88 C95 C97 C98 C99 C101 C112 C113 C114 C115 C116 C120 C122 C126 C138 C147 C154 C205 C309 C316 C322 C323 C324 C325 C326 C327 C333 C334 C335 C336 C337 C338 C340 C341 C342 C343 C344 C345 C353 C354 C370 C376 C431 C483 L4 L5 R19 R23 R42 R43 R44 R45 R52 R53 R55 R61 R94 R95 R96 R147 R221 R224 R227 R228 R229 R230 R231 R232 R233 R234 R235
component class PowerSupplies: C22 C27 C30 C32 C36 C40 C42 C48 C130 C131 C132 C133 C137 C144 C187 C194 C195 C299 C301 C302 C303 C304 C362 C363 C364 C365 C366 C367 C381 C382 C383 C384 C385 C386 C387 C388 C389 C390 C391 C419 C420 IC6 IC14 IC23 IC37 J3 J4 LD5 LD6 LD7 LD8 LD9 LD10 LD12 R5 R14 R16 R18 R21 R24 R26 R27 R31 R32 R37 R39 R40 R47 R48 R49 R51 R59 R60 R62 R63 R64 R65 R67 R74 R86 R87 R88 R89 R90 R91 R152 R153 R156 R157 R158 R159 R299 R302 R303 R306 R307 R308 R309 R310 T7 T8 T9 T10 T15 TP5 TP6 TP7 TP8 TP9 TP10 TP11 TP12 TP34 TP35 TP36 W1
component class U_DIOT_connectors_P1_P2_P3: B28 B29 C63 C70 C71 C72 C410 C411 C449 C450 D3 D5 D6 D7 D8 J14 J29 J33 R262 R263 R266 R267 R268 R269 R270 R271 R272 R276 R277 R278 R279 R280 R281 R282 R283 R284 R285 R286 R287 R288 R293 R294 R295 R296 R300
component class U_FPGAGTP: C41 C54 C77 C100 C141 C157 C200 C201 C203 C236 C237 C238 C245 C295 C297 C300 C392 C393 C394 C395 C403 C405 C413 C414 C415 C416 C417 C418 C422 OSC2 R160 R161
component class U_FPGA_SDRAM: C162 C163 C164 C165 C166 C167 C168 C169 C170 C171 C172 C173 C174 C175 C176 C177 C451 C452 C453 C454 C455 C456 C457 C458 C459 C460 C461 C462 C463 C464 C465 C466 C467 C468 C469 C470 C471 C472 C473 C474 C475 C476 C477 C478 IC8 IC9 IC36 R99 R100 R101 R102 R103 R104 R105 R106 R107 R108 R109 R110 R111 R112 R113 R114 R115 R116 R117 R118 R119 R120 R121 R122 R123 R124 R125 R126 R127 R128 R129 R298
component class U_FPGA_I2C: C186 C192 C193 C197 C198 C227 C292 C305 C306 C307 C427 IC15 IC24 IC25 IC27 IC28 IC29 IC30 IC31 IC34 IC35 IC38 R33 R46 R66 R82 R131 R132 R147 R148 R149 R151 R175 R176 R177 R178 R179 R180 R181 R182 R183 R184 R185 R186 R187 R188 R189 R190 R191 R192 R212 R221 R224 R225 R228 R229 R230 R231 R232 R233 R234 R235 R238 R240 R264 R265 R297 T21 T22 TP2 TP3
component class Mechanical: C396 FTG1 FTG2 FTG3 FTG4 FTG5 FTG6 M1 M2 M3 M4 M5 M6 R68 R69 R70 R71 R72 WASHER1 WASHER2
component class ClockRecovery: C1 C2 C3 C4 C5 C6 C7 C8 C9 C10 C11 C12 C13 C14 C15 C16 C17 C18 C19 C20 C21 C23 C24 C25 C26 C28 C29 C38 C43 C44 C45 C46 C47 C49 C188 C189 C190 C191 C199 C225 C226 C234 C239 C241 C242 C243 C278 C279 C286 C287 C288 C289 C290 C291 C296 C298 C401 C402 C421 C479 IC1 IC2 IC3 IC10 IC11 IC12 J1 J2 L1 L2 L3 L23 L29 L35 L36 L37 LD1 OSC1 OSC3 Q1 R1 R2 R3 R4 R6 R7 R8 R10 R12 R15 R17 R22 R25 R28 R29 R30 R34 R35 R36 R38 R41 R50 R54 R56 R97 R98 R210 R211 R236 R237 R242 R243 R244 R245 R246 R247 R248 R250 R251 R252 R253 R254 R255 R256 R304 R305 T1 TP1 TP4 TP20 TP21 TP22 TP23 TP24 TP25
component class FPGAPower&Misc: C31 C33 C34 C35 C37 C39 C50 C51 C52 C53 C55 C56 C57 C58 C59 C60 C61 C62 C64 C65 C66 C67 C68 C69 C75 C76 C78 C79 C80 C81 C82 C83 C84 C85 C86 C87 C88 C89 C90 C91 C92 C93 C94 C95 C96 C97 C98 C99 C101 C102 C103 C104 C105 C106 C107 C108 C109 C110 C111 C112 C113 C114 C115 C116 C117 C118 C119 C120 C121 C122 C123 C124 C125 C126 C127 C128 C129 C134 C135 C136 C138 C139 C140 C143 C145 C146 C147 C148 C149 C150 C151 C152 C153 C154 C155 C156 C158 C196 C235 C240 C308 C309 C310 C311 C312 C313 C314 C315 C316 C317 C318 C319 C320 C321 C322 C323 C324 C325 C326 C327 C328 C329 C330 C331 C332 C333 C334 C335 C336 C337 C338 C339 C340 C341 C342 C343 C344 C345 C346 C347 C348 C349 C350 C351 C352 C353 C354 C355 C356 C357 C358 C359 C360 C361 C368 C369 C370 C371 C372 C373 C374 C375 C376 C377 C378 C379 C380 C428 C429 C430 C431 C432 C433 C480 C481 C482 C483 C484 C485 D15 FB1 FB2 FB3 FB4 HS1 IC32 J8 L4 L5 L7 LD3 R52 R53 R55 R57 R58 R61 T4
component class U_Bank_12_14_35: C159 D17 D18 IC4 J21 LD2 LD13 LD14 LD18 R9 R11 R19 R20 R23 R42 R43 R44 R45 R150 R162 R163 R164 R165 R166 R167 R168 R169 R170 R171 R172 R173 R226 R227 R289 SW1 T2 T3 T12 T19 T20 TP26 TP27 TP28 TP29 TP30 TP31 TP32 TP33
component class USB_Serial_Quad: C202 C205 C206 C207 C208 C209 C210 C211 C212 C213 C214 C215 C216 C217 C218 C219 C220 C221 C222 C223 C224 C293 C409 D2 IC17 IC18 IC19 IC20 IC21 IC22 IC26 J23 J24 L22 L24 L25 Q2 R194 R195 R196 R197 R198 R199 R200 R201 R202 R203 R204 R205 R206 R207 R208 R209 R241 T13 T14 TP15 TP16 TP17 TP18 TP19
net class SFP_0: SFP_0.LED SFP_0.LOS SFP_0.MOD_PRESENT SFP_0.RATE_SELECT SFP_0.RATE_SELECT1 SFP_0.SCL SFP_0.SDA SFP_0.TX_DISABLE SFP_0.TX_FAULT
net class SFP_1: SFP_1.LED SFP_1.LOS SFP_1.MOD_PRESENT SFP_1.RATE_SELECT SFP_1.RATE_SELECT1 SFP_1.SCL SFP_1.SDA SFP_1.TX_DISABLE SFP_1.TX_FAULT
net class SFP_2: SFP_2.LED SFP_2.LOS SFP_2.MOD_PRESENT SFP_2.RATE_SELECT SFP_2.RATE_SELECT1 SFP_2.SCL SFP_2.SDA SFP_2.TX_DISABLE SFP_2.TX_FAULT
net class SFP_RX_TX_0: SFP_RX_TX_0.RD_N SFP_RX_TX_0.RD_P SFP_RX_TX_0.TD_N SFP_RX_TX_0.TD_P
net class SFP_RX_TX_1: SFP_RX_TX_1.RD_N SFP_RX_TX_1.RD_P SFP_RX_TX_1.TD_N SFP_RX_TX_1.TD_P
net class SFP_RX_TX_2: SFP_RX_TX_2.RD_N SFP_RX_TX_2.RD_P SFP_RX_TX_2.TD_N SFP_RX_TX_2.TD_P
differential pair SLOT8_MGT.MGT_Tx: +SLOT8_MGT.MGT_Tx_P -SLOT8_MGT.MGT_Tx_N
differential pair SLOT8_MGT.MGT_Rx: +SLOT8_MGT.MGT_Rx_P -SLOT8_MGT.MGT_Rx_N
differential pair SLOT7_MGT.MGT_Tx: +SLOT7_MGT.MGT_Tx_P -SLOT7_MGT.MGT_Tx_N
differential pair SLOT7_MGT.MGT_Rx: +SLOT7_MGT.MGT_Rx_P -SLOT7_MGT.MGT_Rx_N
differential pair SLOT6_MGT.MGT_Tx: +SLOT6_MGT.MGT_Tx_P -SLOT6_MGT.MGT_Tx_N
differential pair SLOT6_MGT.MGT_Rx: +SLOT6_MGT.MGT_Rx_P -SLOT6_MGT.MGT_Rx_N
differential pair SLOT5_MGT.MGT_Tx: +SLOT5_MGT.MGT_Tx_P -SLOT5_MGT.MGT_Tx_N
differential pair SLOT5_MGT.MGT_Rx: +SLOT5_MGT.MGT_Rx_P -SLOT5_MGT.MGT_Rx_N
differential pair SLOT4_MGT.MGT_Tx: +SLOT4_MGT.MGT_Tx_P -SLOT4_MGT.MGT_Tx_N
differential pair SLOT4_MGT.MGT_Rx: +SLOT4_MGT.MGT_Rx_P -SLOT4_MGT.MGT_Rx_N
differential pair SLOT3_MGT.MGT_Tx: +SLOT3_MGT.MGT_Tx_P -SLOT3_MGT.MGT_Tx_N
differential pair SLOT3_MGT.MGT_Rx: +SLOT3_MGT.MGT_Rx_P -SLOT3_MGT.MGT_Rx_N
differential pair SLOT2_MGT.MGT_Tx: +SLOT2_MGT.MGT_Tx_P -SLOT2_MGT.MGT_Tx_N
differential pair SLOT2_MGT.MGT_Rx: +SLOT2_MGT.MGT_Rx_P -SLOT2_MGT.MGT_Rx_N
differential pair SLOT1_MGT.MGT_Tx: +SLOT1_MGT.MGT_Tx_P -SLOT1_MGT.MGT_Tx_N
differential pair SLOT1_MGT.MGT_Rx: +SLOT1_MGT.MGT_Rx_P -SLOT1_MGT.MGT_Rx_N
differential pair SFP_RX_TX_3.TD: +SFP_RX_TX_3.TD_P -SFP_RX_TX_3.TD_N
differential pair SFP_RX_TX_3.RD: +SFP_RX_TX_3.RD_P -SFP_RX_TX_3.RD_N
differential pair SFP_RX_TX_2.TD: +SFP_RX_TX_2.TD_P -SFP_RX_TX_2.TD_N
differential pair SFP_RX_TX_2.RD: +SFP_RX_TX_2.RD_P -SFP_RX_TX_2.RD_N
differential pair SFP_RX_TX_1.TD: +SFP_RX_TX_1.TD_P -SFP_RX_TX_1.TD_N
differential pair SFP_RX_TX_1.RD: +SFP_RX_TX_1.RD_P -SFP_RX_TX_1.RD_N
differential pair SFP_RX_TX_0.TD: +SFP_RX_TX_0.TD_P -SFP_RX_TX_0.TD_N
differential pair SFP_RX_TX_0.RD: +SFP_RX_TX_0.RD_P -SFP_RX_TX_0.RD_N
differential pair MGT_CLK3_C: +MGT_CLK3_C_P -MGT_CLK3_C_N
differential pair USB_D_IN: +USB_D_IN_P -USB_D_IN_N
differential pair CLK_OUT_CON: +CLK_OUT_CON_P -CLK_OUT_CON_N
differential pair CLK_OUT: +CLK_OUT_P -CLK_OUT_N
differential pair CLK_IN: +CLK_IN_P -CLK_IN_N
differential pair MGT_CLK_ext: +MGT_CLK_ext_P -MGT_CLK_ext_N
differential pair MGT_CLK_ext_C: +MGT_CLK_ext_C_P -MGT_CLK_ext_C_N
differential pair DIOT_CLK_IN_0.CLK: +DIOT_CLK_IN_0.CLK_P -DIOT_CLK_IN_0.CLK_N
differential pair CKC_GTP_125: +CKC_GTP_125_P -CKC_GTP_125_N
differential pair MGT_CLK3.CLK: +MGT_CLK3.CLK_P -MGT_CLK3.CLK_N
differential pair S3_TX: +S3_TX_P -S3_TX_N
differential pair S3_RX: +S3_RX_P -S3_RX_N
differential pair S2_TX: +S2_TX_P -S2_TX_N
differential pair S2_RX: +S2_RX_P -S2_RX_N
differential pair S1_TX: +S1_TX_P -S1_TX_N
differential pair S1_RX: +S1_RX_P -S1_RX_N
differential pair S0_TX: +S0_TX_P -S0_TX_N
differential pair S0_RX: +S0_RX_P -S0_RX_N
differential pair S3C_TX: +S3C_TX_P -S3C_TX_N
differential pair S3C_RX: +S3C_RX_P -S3C_RX_N
differential pair S2C_TX: +S2C_TX_P -S2C_TX_N
differential pair S2C_RX: +S2C_RX_P -S2C_RX_N
differential pair S1C_TX: +S1C_TX_P -S1C_TX_N
differential pair S1C_RX: +S1C_RX_P -S1C_RX_N
differential pair S0C_TX: +S0C_TX_P -S0C_TX_N
differential pair S0C_RX: +S0C_RX_P -S0C_RX_N
differential pair MGT_CLK2_C: +MGT_CLK2_C_P -MGT_CLK2_C_N
differential pair MGT_CLK2.CLK: +MGT_CLK2.CLK_P -MGT_CLK2.CLK_N
differential pair MGT_CLK1_C: +MGT_CLK1_C_P -MGT_CLK1_C_N
differential pair MGT_CLK1.CLK: +MGT_CLK1.CLK_P -MGT_CLK1.CLK_N
differential pair SLOT8.LVDS_15: +SLOT8.LVDS_15_P -SLOT8.LVDS_15_N
differential pair SLOT8.LVDS_14: +SLOT8.LVDS_14_P -SLOT8.LVDS_14_N
differential pair SLOT8.LVDS_13: +SLOT8.LVDS_13_P -SLOT8.LVDS_13_N
differential pair SLOT8.LVDS_12: +SLOT8.LVDS_12_P -SLOT8.LVDS_12_N
differential pair SLOT8.LVDS_11: +SLOT8.LVDS_11_P -SLOT8.LVDS_11_N
differential pair SLOT8.LVDS_10: +SLOT8.LVDS_10_P -SLOT8.LVDS_10_N
differential pair SLOT8.LVDS_9: +SLOT8.LVDS_9_P -SLOT8.LVDS_9_N
differential pair SLOT8.LVDS_8: +SLOT8.LVDS_8_P -SLOT8.LVDS_8_N
differential pair SLOT8.LVDS_7: +SLOT8.LVDS_7_P -SLOT8.LVDS_7_N
differential pair SLOT8.LVDS_6: +SLOT8.LVDS_6_P -SLOT8.LVDS_6_N
differential pair SLOT8.LVDS_5: +SLOT8.LVDS_5_P -SLOT8.LVDS_5_N
differential pair SLOT8.LVDS_4: +SLOT8.LVDS_4_P -SLOT8.LVDS_4_N
differential pair SLOT8.LVDS_3: +SLOT8.LVDS_3_P -SLOT8.LVDS_3_N
differential pair SLOT8.LVDS_2: +SLOT8.LVDS_2_P -SLOT8.LVDS_2_N
differential pair SLOT8.LVDS_1: +SLOT8.LVDS_1_P -SLOT8.LVDS_1_N
differential pair SLOT8.LVDS_0: +SLOT8.LVDS_0_P -SLOT8.LVDS_0_N
differential pair SLOT7.LVDS_15: +SLOT7.LVDS_15_P -SLOT7.LVDS_15_N
differential pair SLOT7.LVDS_14: +SLOT7.LVDS_14_P -SLOT7.LVDS_14_N
differential pair SLOT7.LVDS_13: +SLOT7.LVDS_13_P -SLOT7.LVDS_13_N
differential pair SLOT7.LVDS_12: +SLOT7.LVDS_12_P -SLOT7.LVDS_12_N
differential pair SLOT7.LVDS_11: +SLOT7.LVDS_11_P -SLOT7.LVDS_11_N